# Altium PCB NB2DSK01.PcbDoc (part 1 of 17)
Units mil, origin at the board's own origin, x right, y up, seen from the top; angles counter-clockwise.
Board outline 11815 x 6500.03 mil, 8 copper layers (Top Layer, MidLayer1, MidLayer2, GND, PWR, MidLayer3, MidLayer4, Bottom Layer), stack 74.62 mil thick; 798 components, 1002 nets, 3927 pads, 3182 vias.
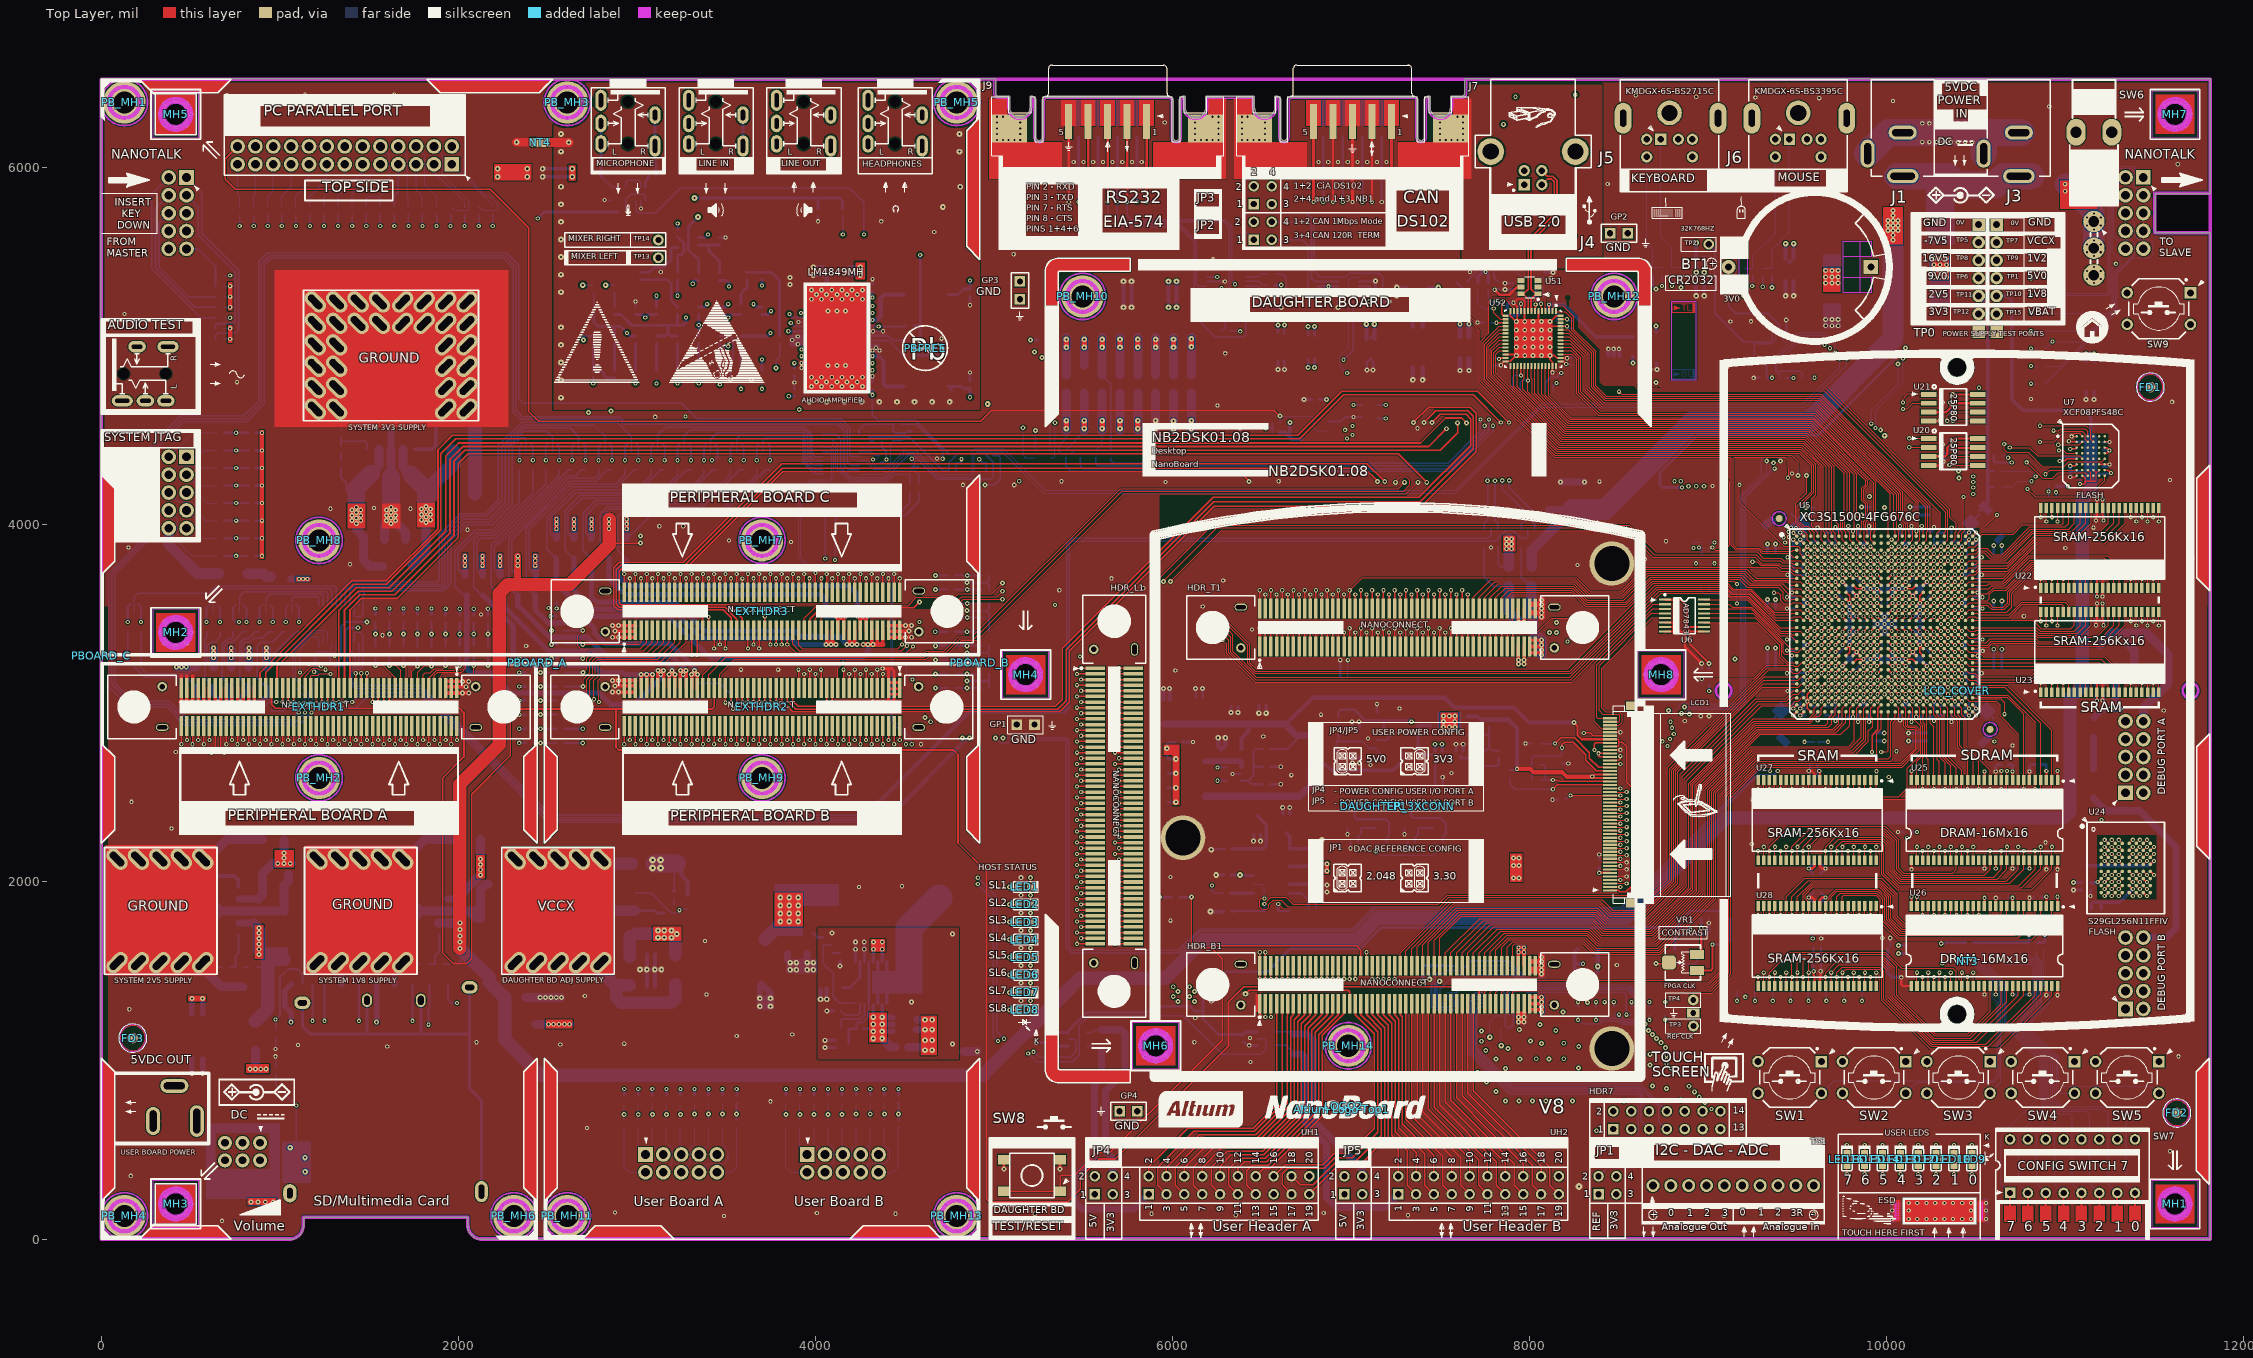
[diagram p0: Top Layer view]
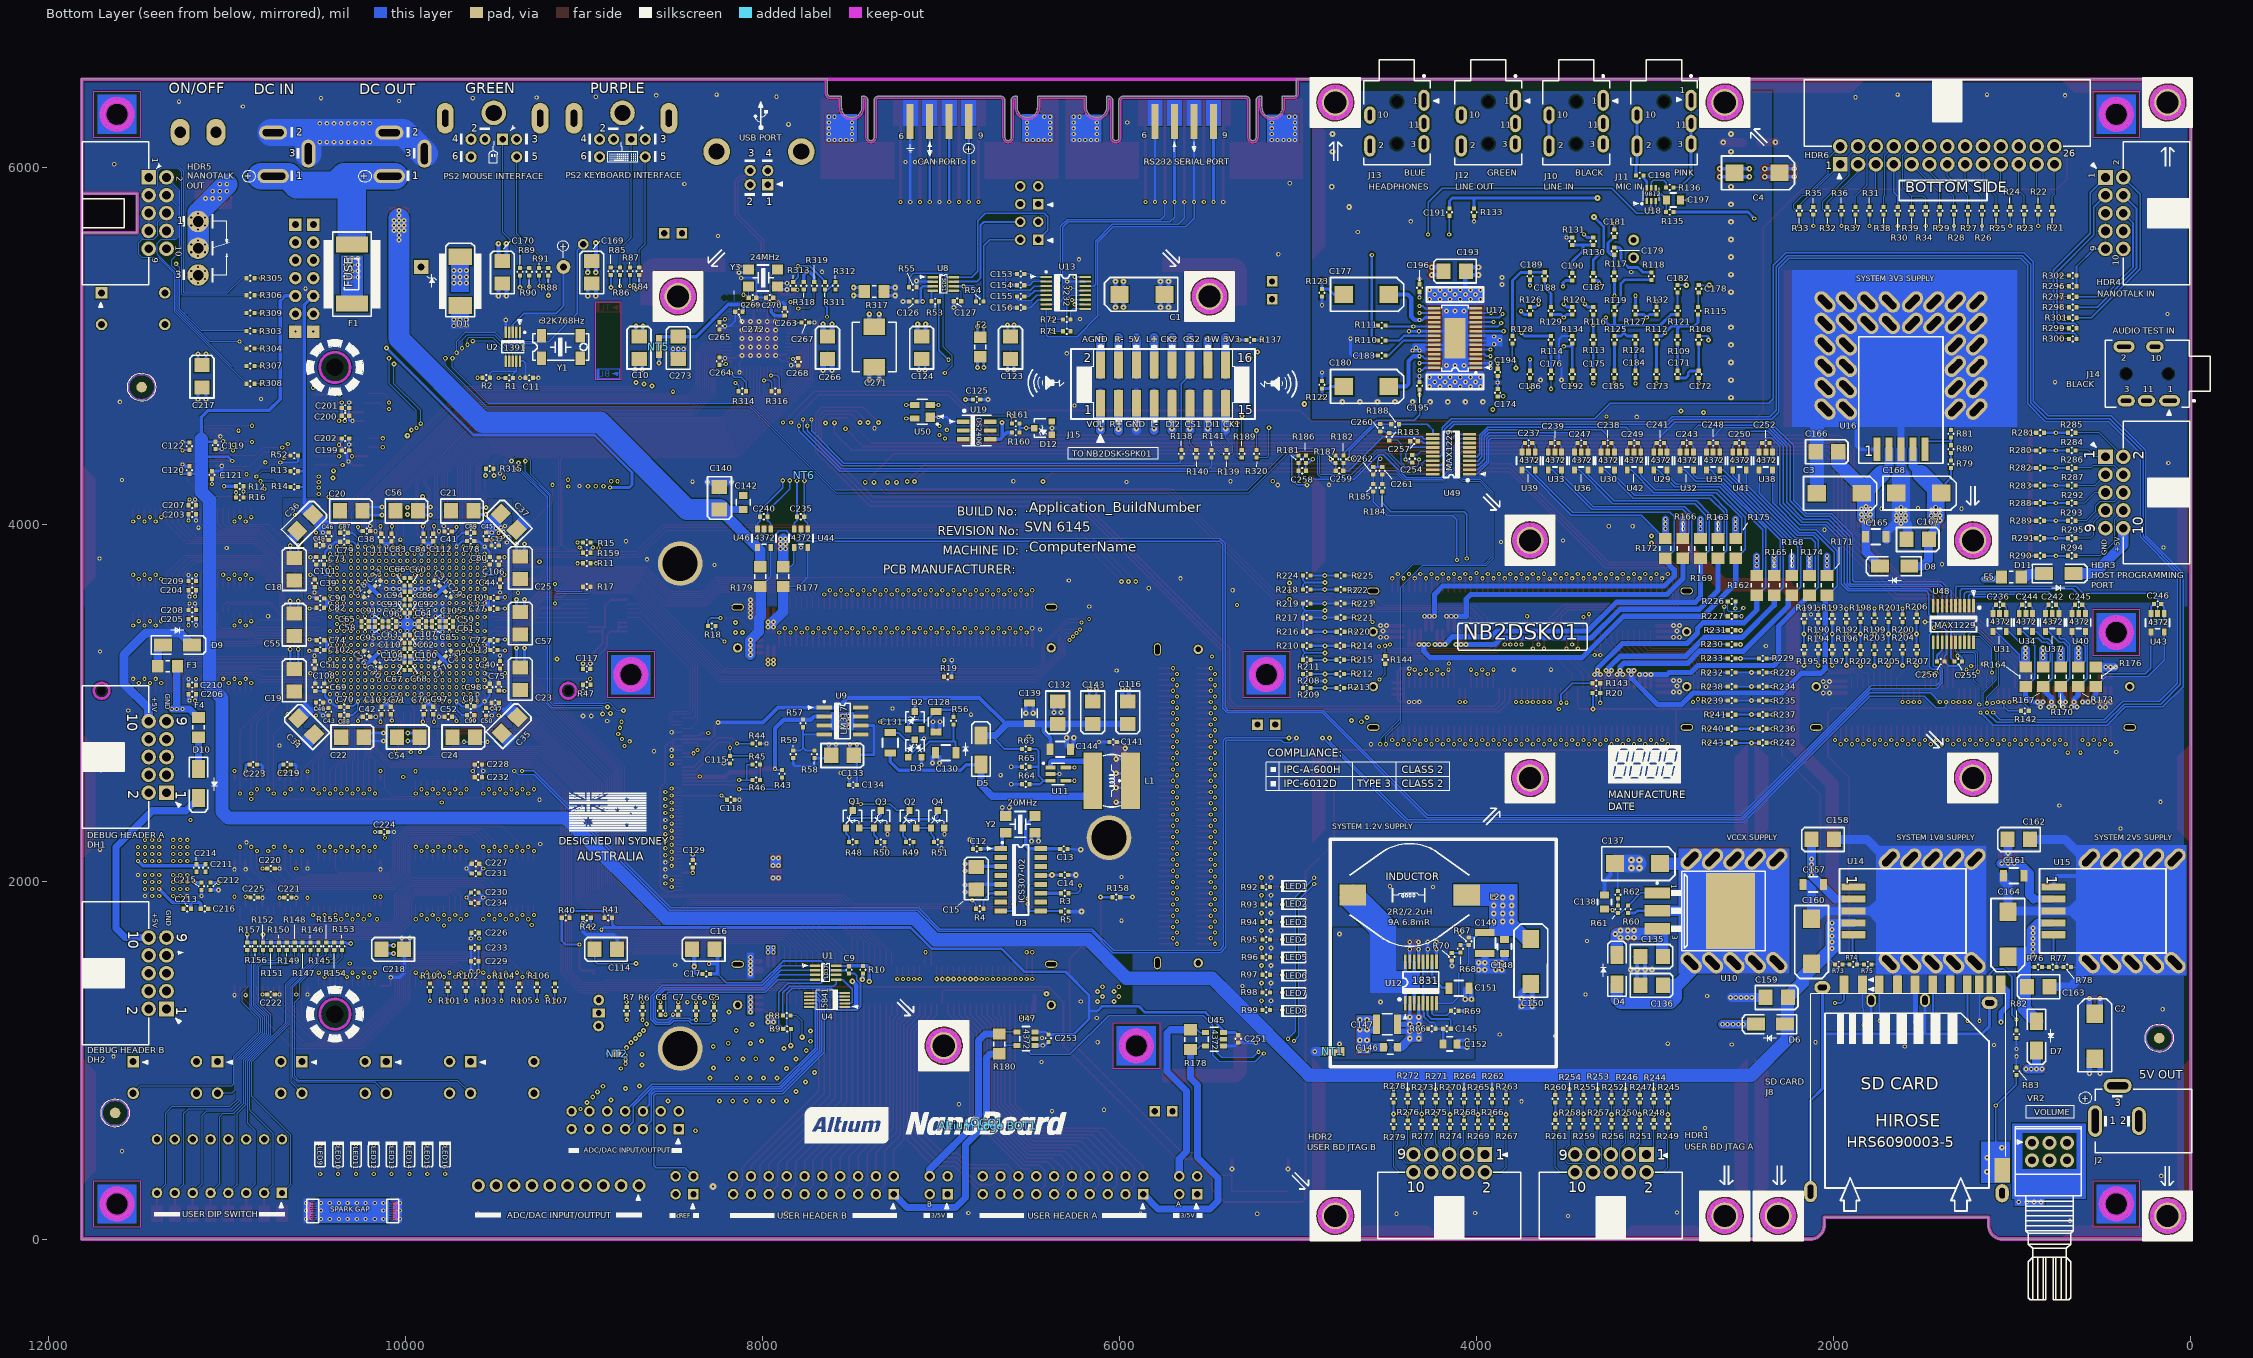
[diagram p1: Bottom Layer view, seen from below]
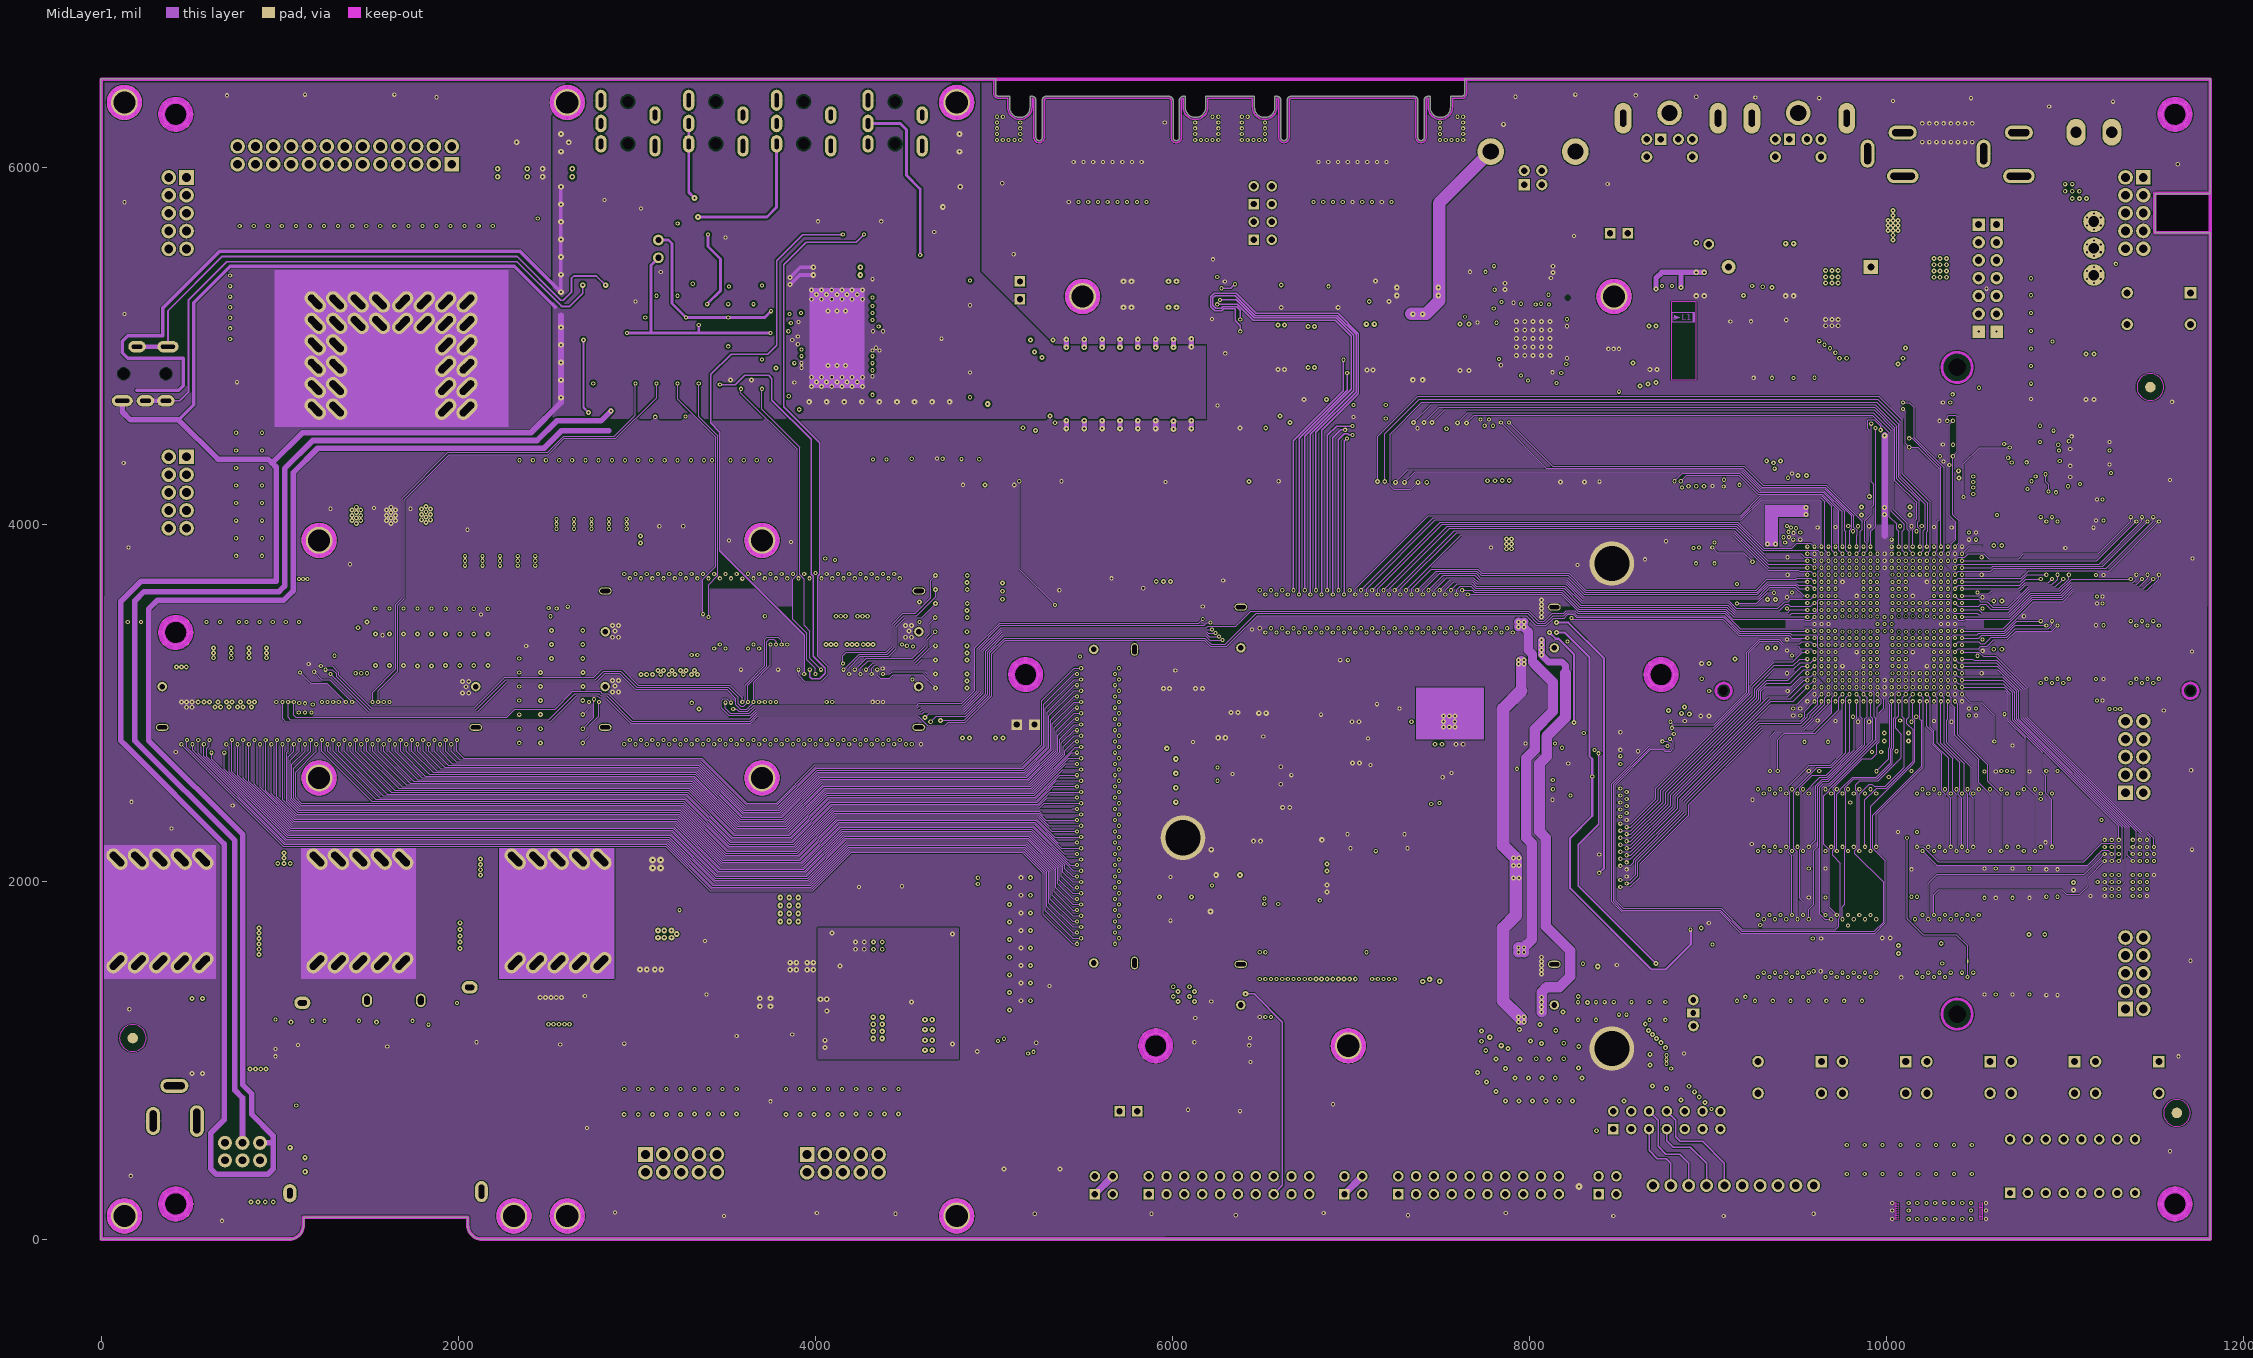
[diagram p2: MidLayer1]
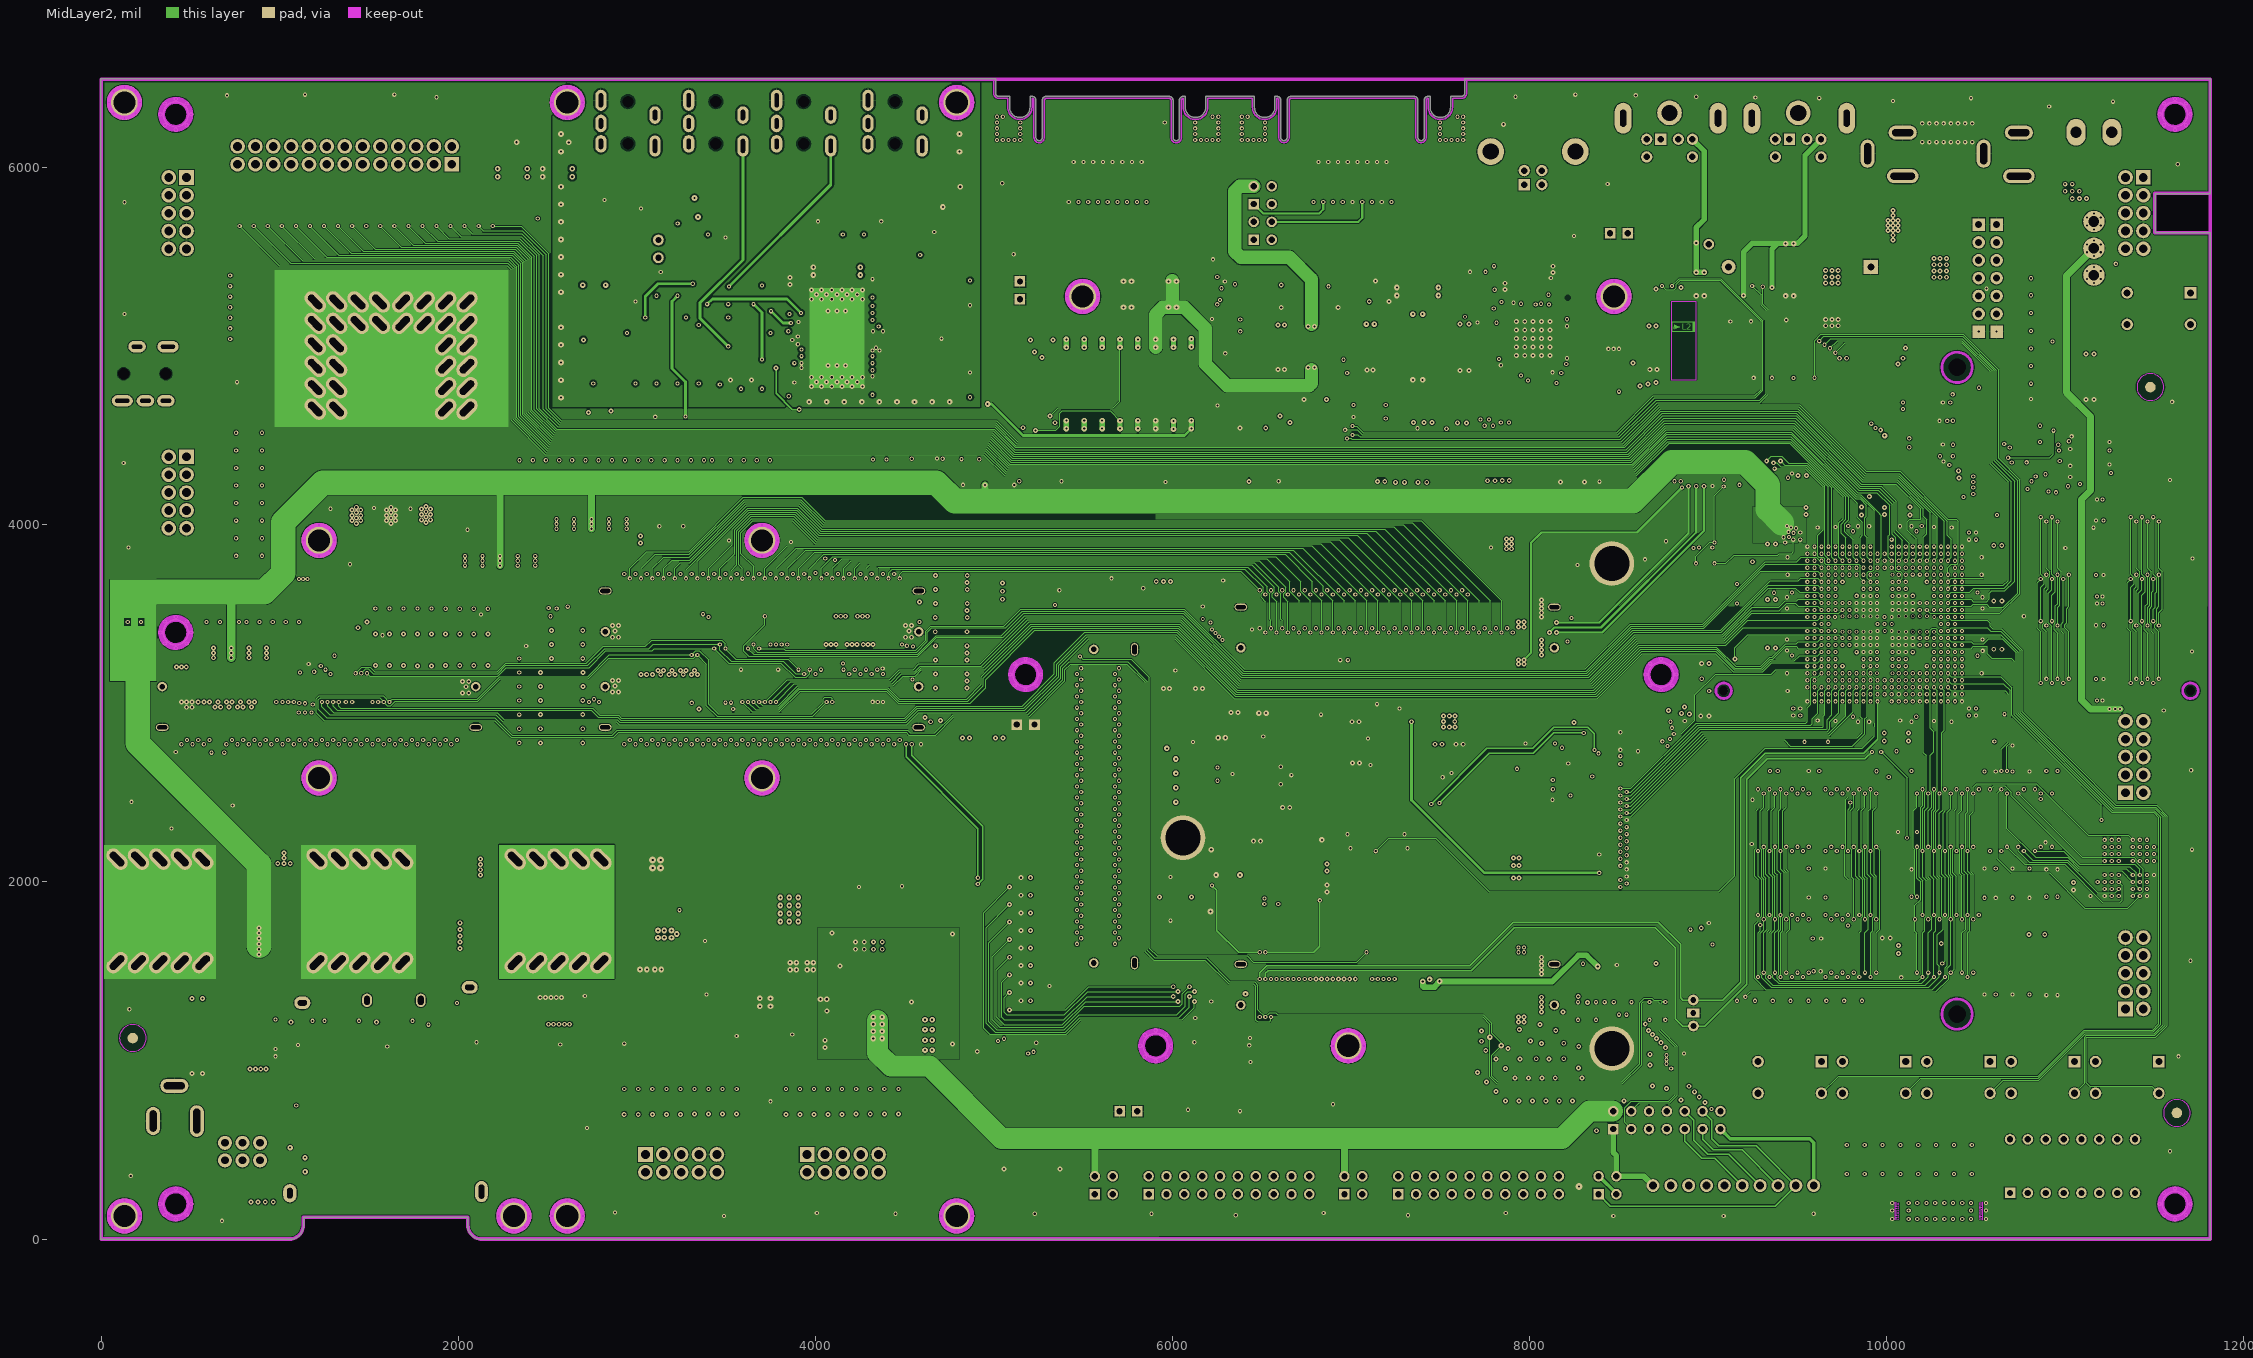
[diagram p3: MidLayer2]
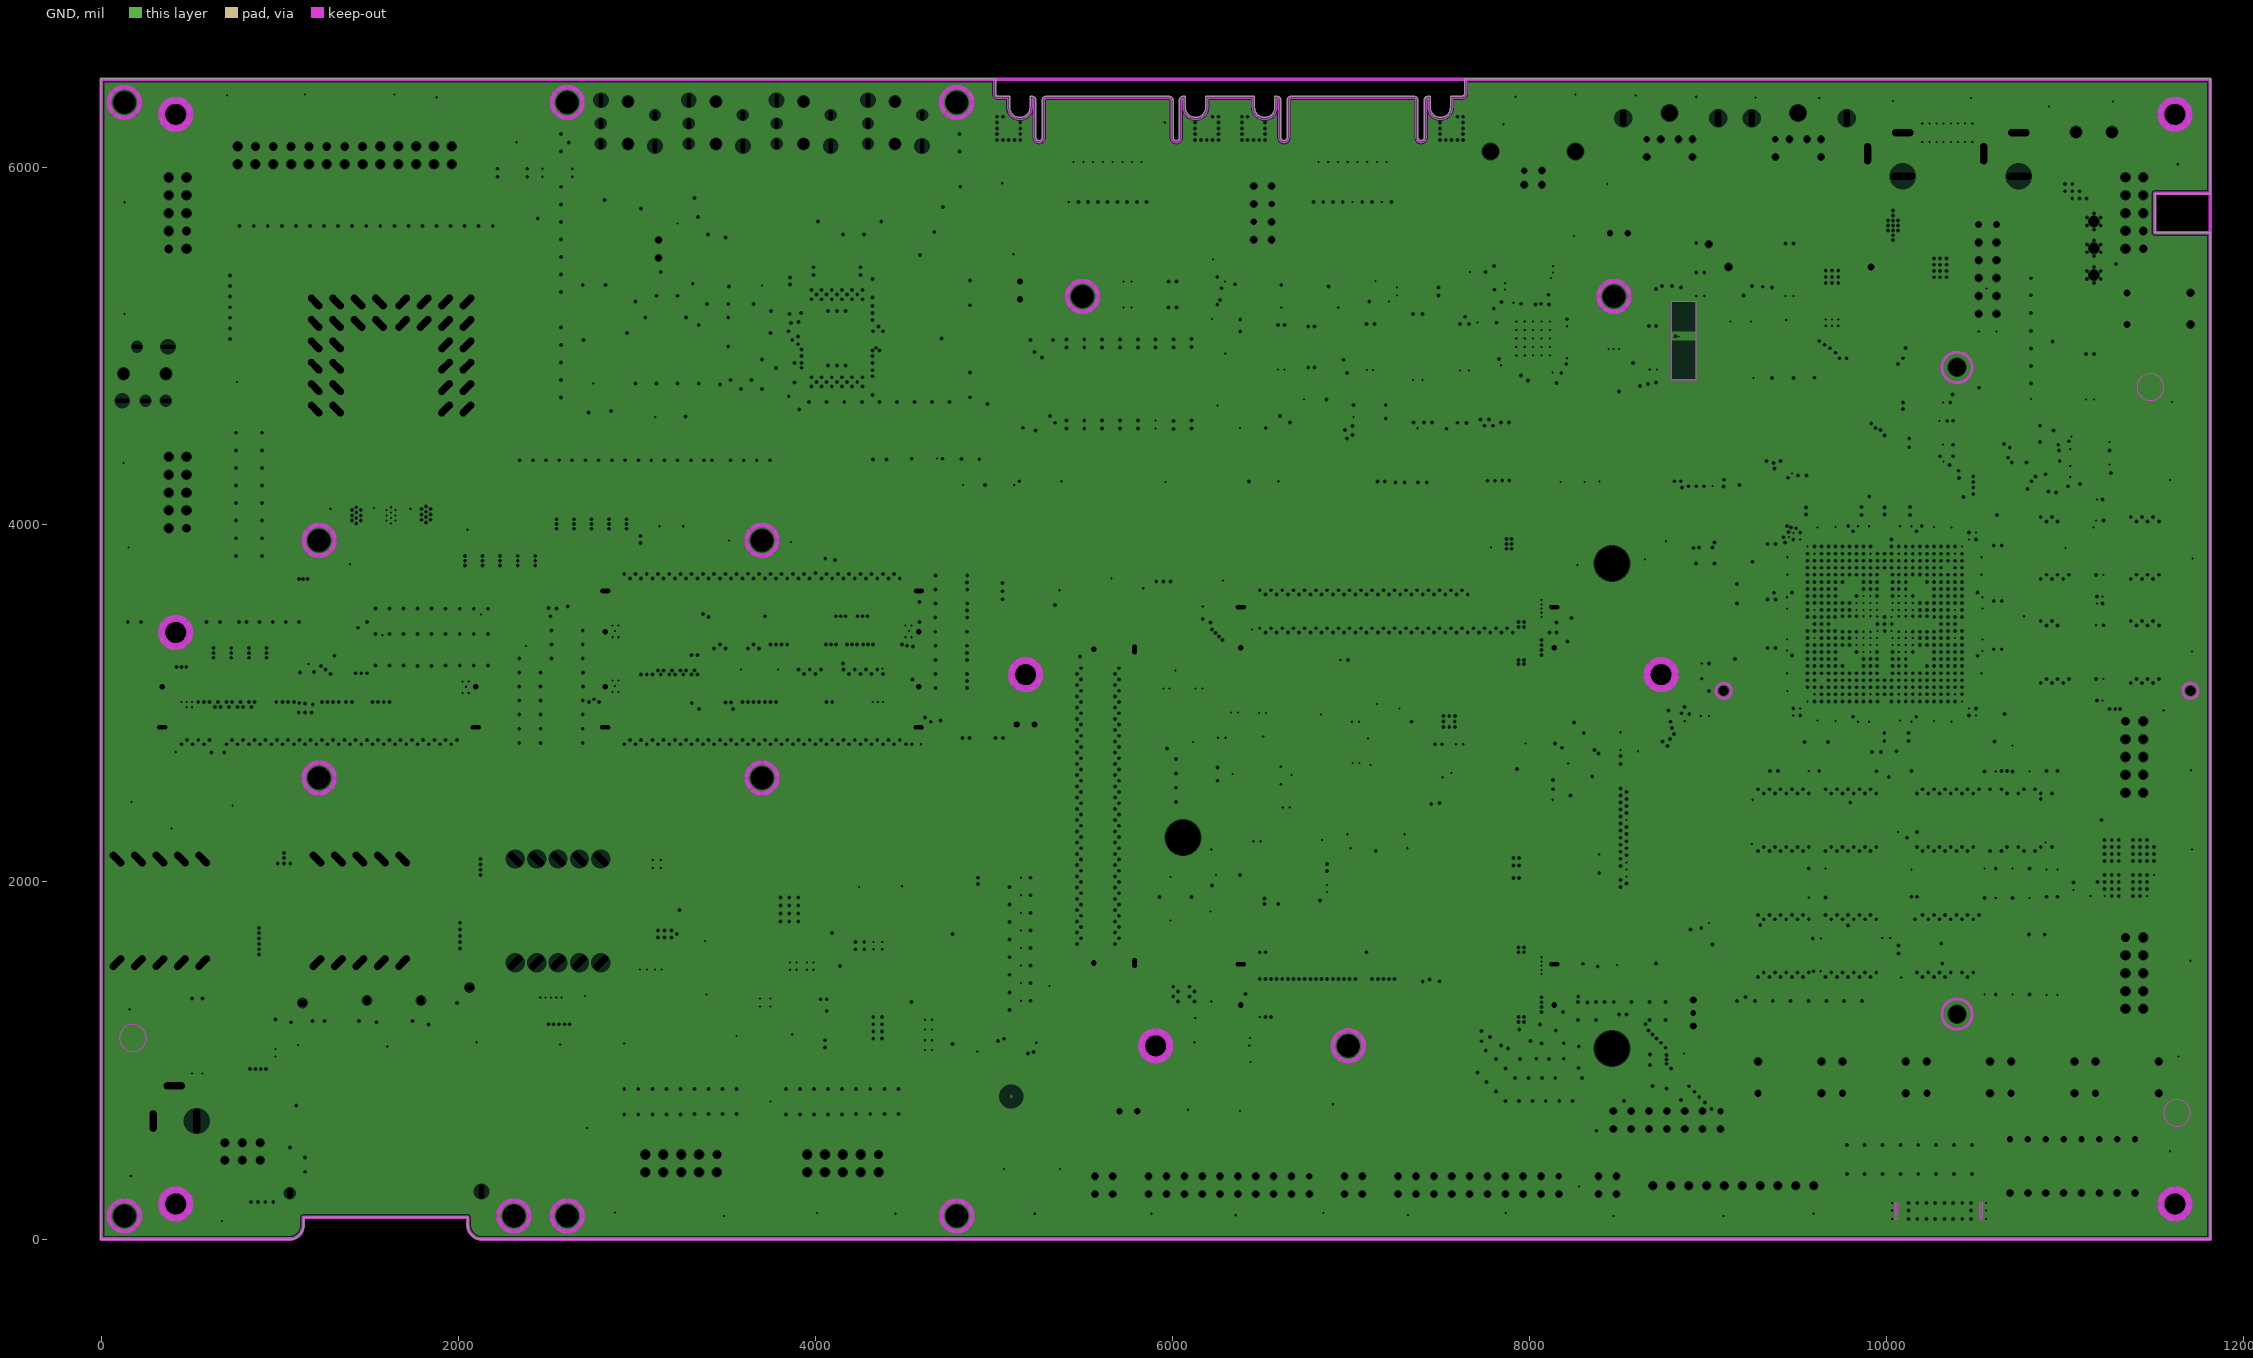
[diagram p4: GND, clearances drawn from the general rule]
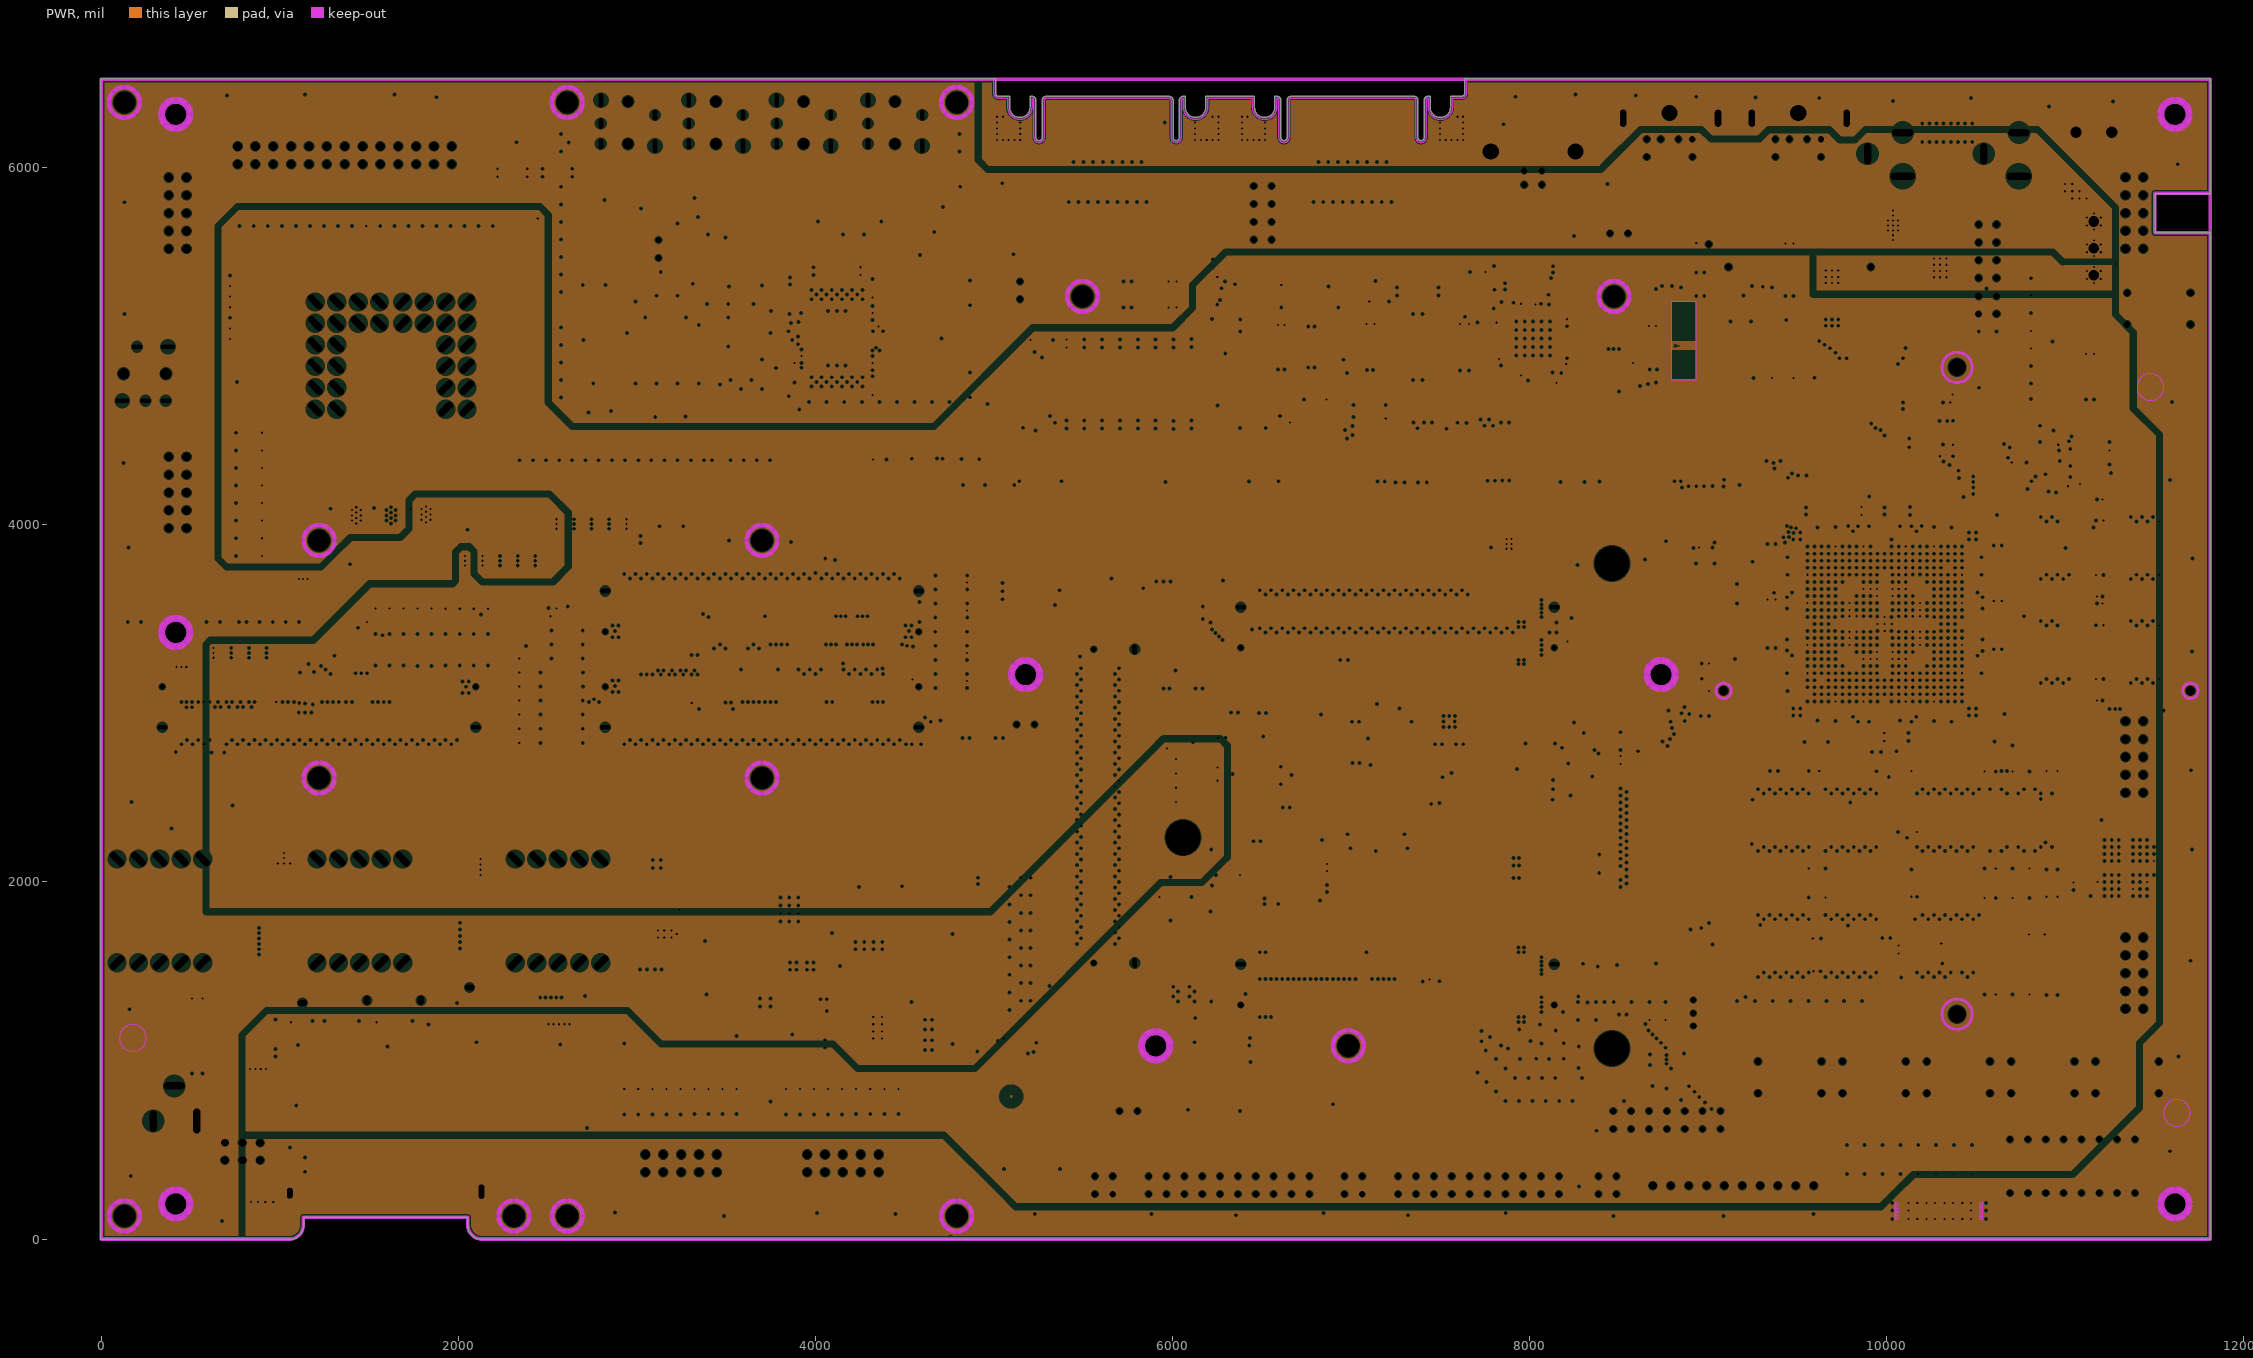
[diagram p5: PWR, clearances drawn from the general rule]
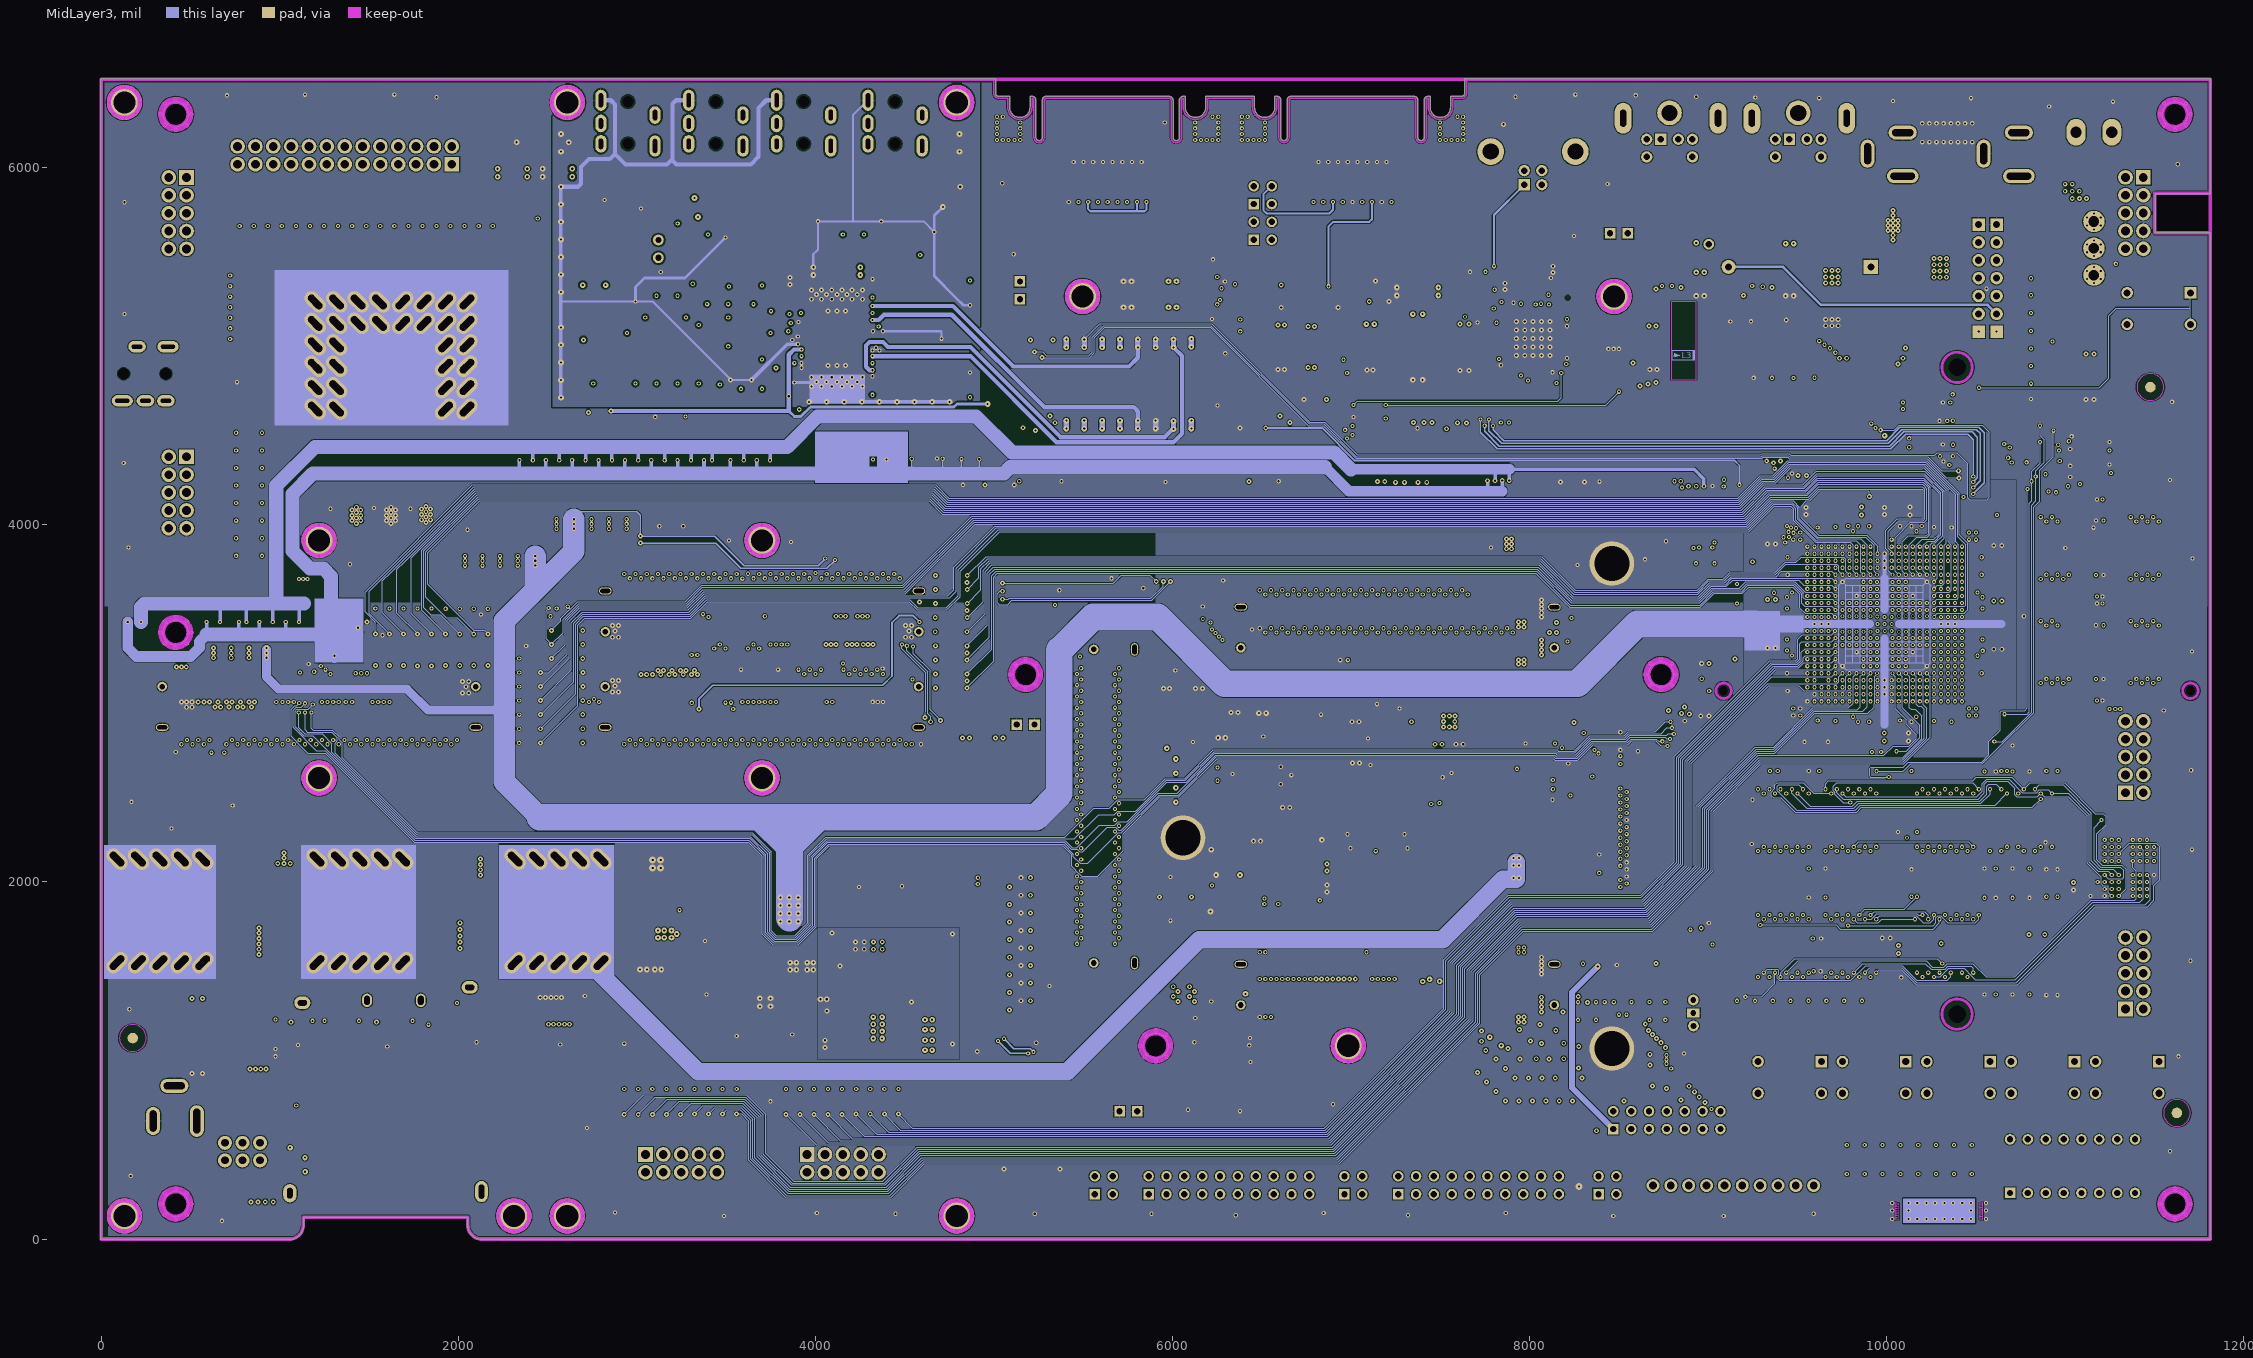
[diagram p6: MidLayer3]
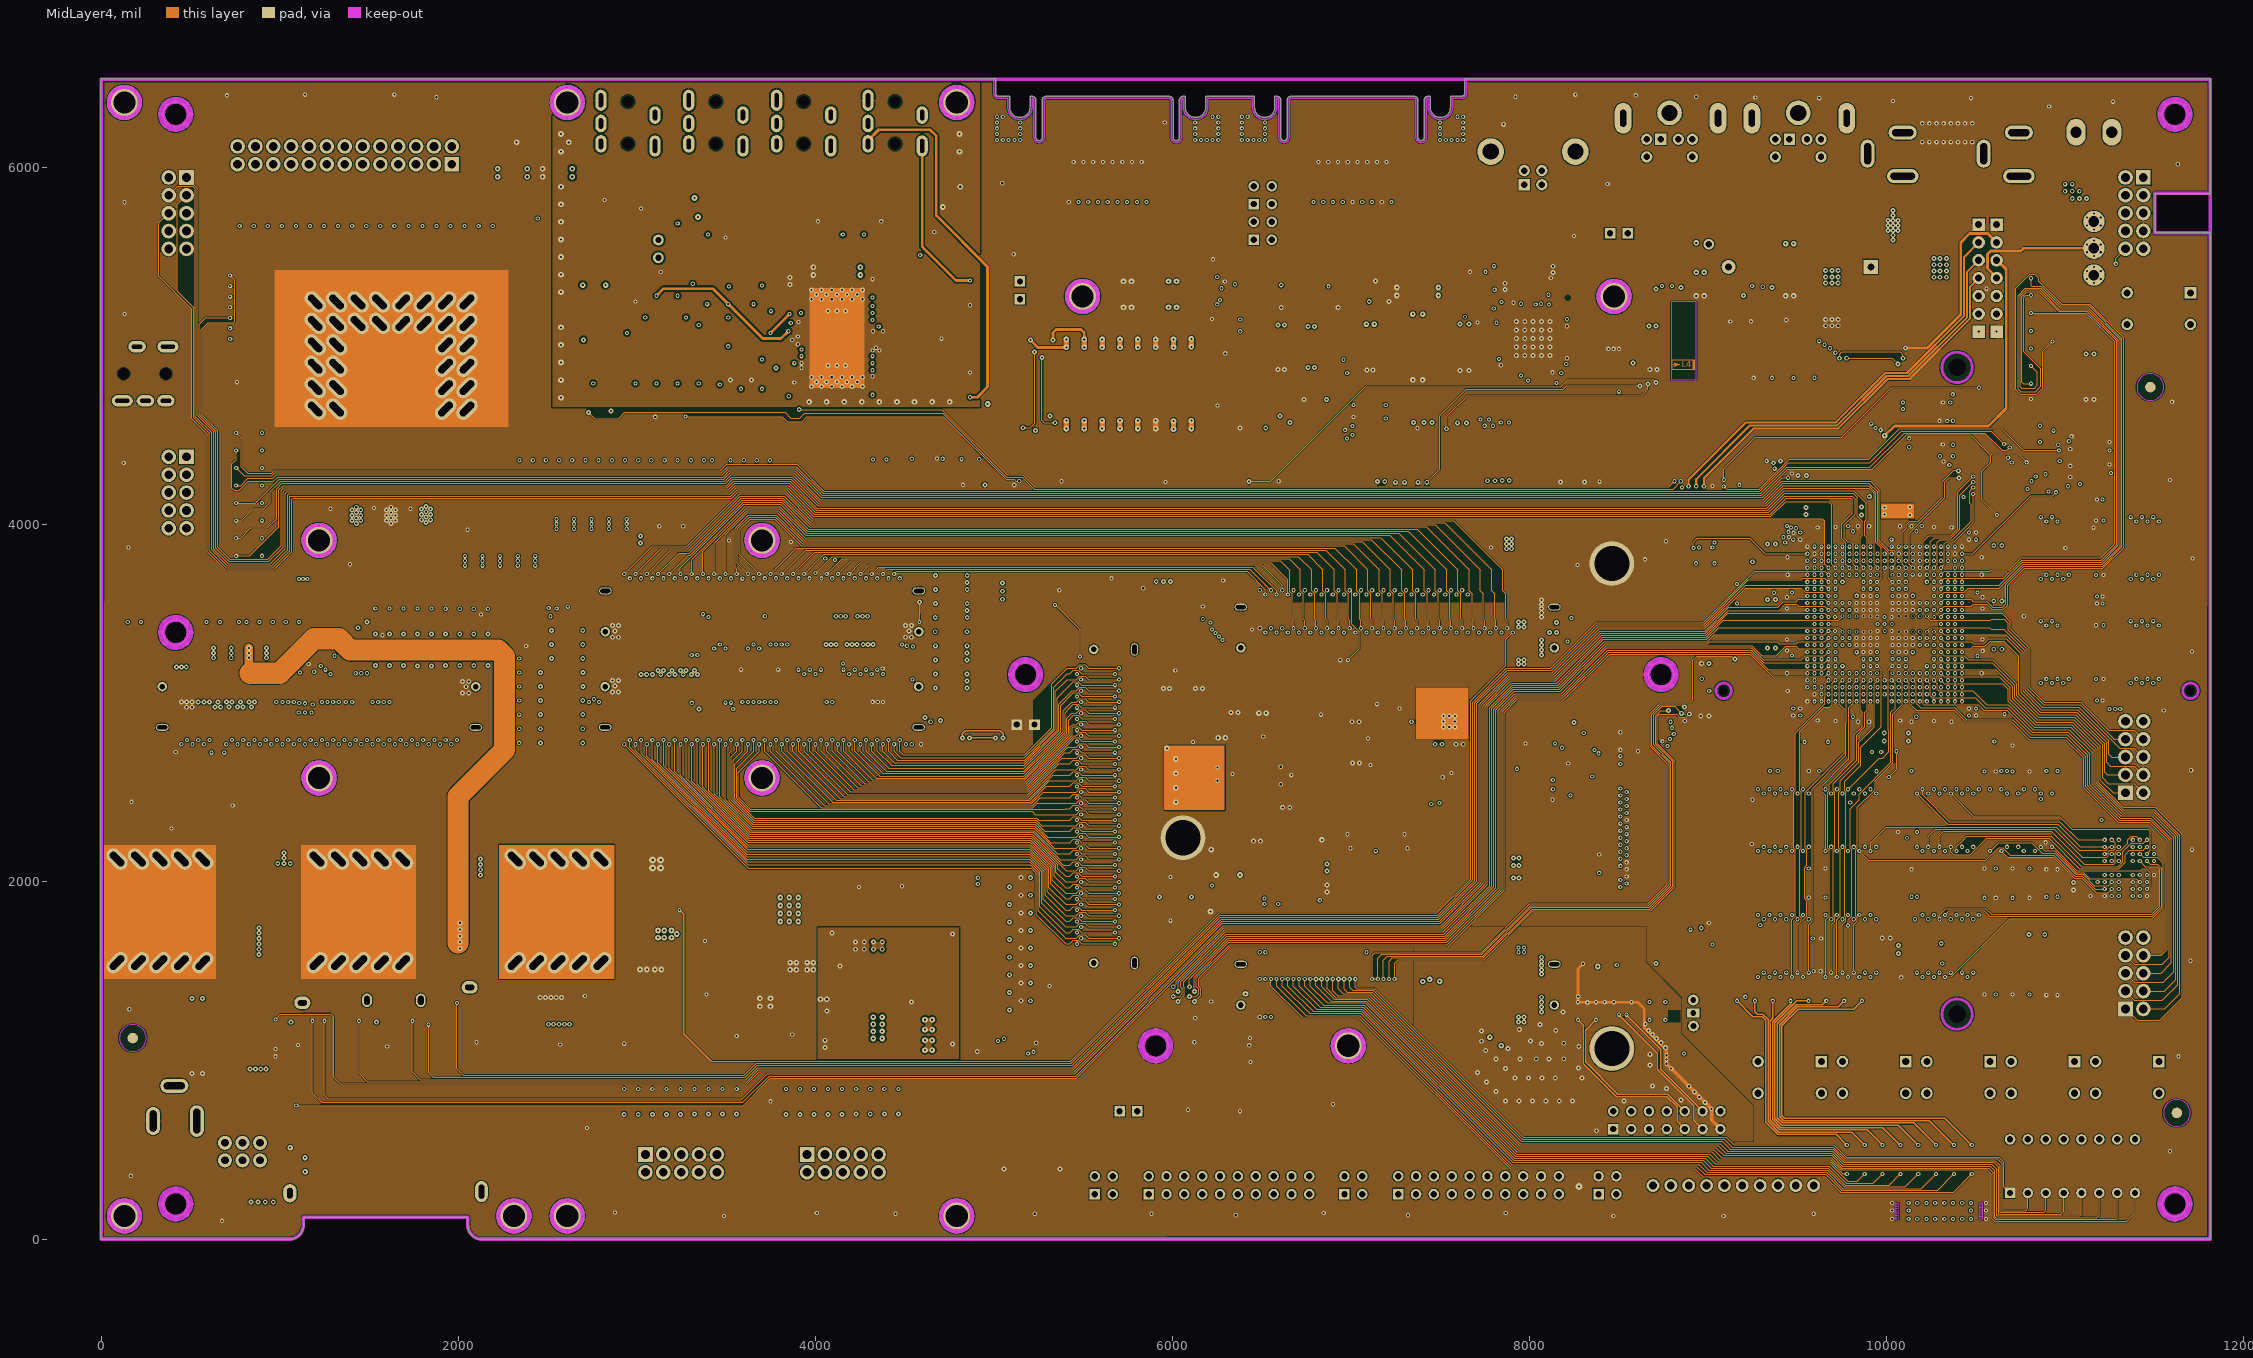
[diagram p7: MidLayer4]

## Layer stack, top to bottom
Top Layer: signal copper 1.4
Dielectric: core 9.0551, FR-4, Dk 4.8
MidLayer1: signal copper 1.4
Dielectric: prepreg 9.0551, FR-4, Dk 4.8
MidLayer2: signal copper 1.4
Dielectric: core 9.0551, FR-4, Dk 4.8
GND: plane copper 1.4173, net GND
Dielectric: prepreg 9.0551, FR-4, Dk 4.8
PWR: plane copper 1.4173, net (Multiple Nets)
Dielectric: core 9.0551, FR-4, Dk 4.8
MidLayer3: signal copper 1.4
Dielectric: prepreg 9.0551, FR-4, Dk 4.8
MidLayer4: signal copper 1.4
Dielectric: core 9.0551, FR-4, Dk 4.8
Bottom Layer: signal copper 1.4

## Board outline
0,-1.98 1053.39,-1.98 ccw(c1053.39,78.74) 1134.12,78.74 1134.12,121.47 2051.7,121.47 2051.7,78.74 ccw(c2132.42,78.74) 2132.42,-1.98 11811.02,-1.98 ccw(c11811.02,0) 11813.01,0 11813.01,5634.92 ccw(c11811.02,5634.92) 11811.02,5636.91 11503.18,5636.91 11503.18,5854.43 11811.02,5854.43 ccw(c11811.02,5856.42) 11813.01,5856.42 11813.01,6495.91 ccw(c11811.03,6496.06) 11813.01,6496.06 ccw(c11811.03,6496.06) 11811.03,6498.05 7637.8,6498.05 ccw(c7637.8,6496.06) 7635.82,6496.06 7635.82,6417.32 cw(c7618.11,6417.32) 7618.11,6399.62 7558.86,6399.62 ccw(c7558.86,6397.64) 7556.89,6397.42 7556.89,6338.58 cw(c7499.82,6338.58) 7442.75,6338.58 7442.75,6397.64 ccw(c7440.76,6397.64) 7440.76,6399.62 7431.12,6399.62 ccw(c7431.12,6377.95) 7409.45,6377.95 7409.45,6169.29 cw(c7391.75,6169.29) 7374.05,6169.29 7374.05,6377.95 ccw(c7352.38,6377.95) 7352.38,6399.62 6663.4,6399.62 ccw(c6663.4,6377.95) 6641.73,6377.95 6641.73,6169.29 cw(c6624.03,6169.29) 6606.33,6169.29 6606.33,6377.95 ccw(c6584.66,6377.95) 6584.66,6399.62 6575.02,6399.62 ccw(c6575.02,6397.64) 6573.03,6397.64 6573.03,6338.58 cw(c6515.96,6338.58) 6458.89,6338.58 6458.89,6397.64 ccw(c6456.91,6397.64) 6456.91,6399.62 6187.66,6399.62 ccw(c6187.66,6397.64) 6185.68,6397.64 6185.68,6338.58 cw(c6128.61,6338.58) 6071.53,6338.58 6071.53,6397.64 ccw(c6069.55,6397.64) 6069.55,6399.62 6059.91,6399.62 ccw(c6059.91,6377.95) 6038.24,6377.95 6038.24,6169.29 cw(c6020.54,6169.29) 6002.83,6169.29 6002.83,6377.95 ccw(c5981.16,6377.95) 5981.16,6399.62 5292.19,6399.62 ccw(c5292.19,6377.95) 5270.52,6377.95 5270.52,6169.29 cw(c5252.82,6169.29) 5235.12,6169.29 5235.12,6377.95 ccw(c5213.45,6377.95) 5213.45,6399.62 5203.8,6399.62 ccw(c5203.8,6397.64) 5201.82,6397.64 5201.82,6338.58 cw(c5144.75,6338.58) 5087.68,6338.58 5087.68,6397.64 ccw(c5085.69,6397.64) 5085.69,6399.62 5026.43,6399.62 cw(c5026.43,6417.32) 5008.73,6417.32 5008.73,6496.06 ccw(c5006.74,6496.06) 5006.74,6498.05 0,6498.05 ccw(c0,6496.06) -1.98,6496.06 -1.98,0 ccw(c0,0)

## Design rules (kind name [scope] priority, off if disabled: settings)
Clearance [InNamedPolygon('MidLayer3-AGND')] p1: gap=10
Clearance "Pad Via different nets" [IsPad vs IsVia] p2: gap=4.5
Clearance Clearance_Poly_USB [InNamedPolygon('USB-ML1-GND') Or InNamedPolygon('USB-TL-GND') Or InNamedPolygon('USB-TL-SHIELD')] p3: gap=10
Clearance Clearance_Poly_Tight [InNamedPolygon('FPGAPWR-BL-1V2') Or InNamedPolygon('FPGAPWR-BL-3V3') Or InNamedPolygon('FPGAPWR-BL-2V5A') Or InNamedPolygon('FPGAPWR-BL-2V5B') Or InNamedPolygon('FPGAPWR-BL-2V5C') Or InNamedPolygon('FPGAPWR-BL-2V5D') Or InNamedPolygon('FPGAPWR-ML1-1V2') Or InNamedPolygon('FPGAPWR-BL-2V5E') Or InNamedPolygon('FPGAPWR-BL-3V3' )] p4: gap=5
Clearance Clearance_Poly_AUGND [InPolygon And InNet(AUGND)] p5: gap=10
Clearance Clearance_PowerPolygon [InPolygon And InNetClass(PWRNET)] p6: gap=5
Clearance "Pad-Pad Clearance" [IsPad vs IsPad] p7: gap=5
Clearance "General Clearance" [All] p8: gap=5
ComponentClearance ComponentClearance_RES2RES [HasFootprint('RESC2012') vs HasFootprint('RESC2012')] p1: gap=-3.94 collisioncheckmode=3 verticalgap=10 showdistances=FALSE
ComponentClearance ComponentClearance_HDR2HDR [HasFootprint('HDR2X2') vs HasFootprint('HDR2X2')] p2: gap=-7.87 collisioncheckmode=3 verticalgap=10 showdistances=FALSE
ComponentClearance ComponentClearance_LED2LED [HasFootprint('LED2013') vs HasFootprint('LED2013')] p3: gap=-7.87 collisioncheckmode=3 verticalgap=10 showdistances=FALSE
ComponentClearance ComponentClearance_Bottom [OnBottom And (Not InComponentClass(Templates)) vs OnBottom And (Not InComponentClass(Templates))] p4: gap=3.94 collisioncheckmode=3 verticalgap=10 showdistances=FALSE
ComponentClearance ComponentClearance_Top [OnTop And (Not InComponentClass(Templates)) vs OnTop And (Not InComponentClass(Templates))] p5: gap=3.94 collisioncheckmode=3 verticalgap=10 showdistances=FALSE
DiffPairsRouting DiffPair_DiffPairsRouting [All] p1: maxlimit=12.6 minlimit=11.02 mostfreqgap=7.87 toplayer_prefgap=11.81 midlayer1_prefgap=11.81 midlayer2_prefgap=11.81 midlayer3_prefgap=11.81 midlayer4_prefgap=11.81 bottomlayer_prefgap=11.81 maxuncoupledlength=500
DiffPairsRouting PairRoute [All] p2: maxlimit=5.91 minlimit=5 mostfreqgap=5 maxuncoupledlength=393.7
FanoutControl Fanout_BGA [All] p1: bgadir=Out bgaviamode=Centered fanoutstyle=BGA fanoutdirection=OutOnly viagrid=1 // Fanout_BGA (Default Rule)
HoleSize [IsPad And (holesize <> 0)] p1: absolutevalues=TRUE maxlimit=204.72 minlimit=11.81 maxpercent=80.000 minpercent=20.000
MatchedLengths DiffPair_MatchedLengths [(IsDifferentialPair And (Name = 'USB_DP'))] p1: tolerance=393.7 checknetsindiffpair=TRUE checkdiffpairvsdiffpair=TRUE checkothers=TRUE
MatchedLengths DiffPair_MatchedLengths_1 [(IsDifferentialPair And (Name = 'DIFF_RX1'))] p2: tolerance=1000 checknetsindiffpair=TRUE checkdiffpairvsdiffpair=TRUE checkothers=TRUE
MinimumAnnularRing [PadIsPlated And (Name <> 'Y1_RT')] p1 off: minimumring=7.87
PlaneClearance [All] p1: clearance=5
PlaneConnect vias [IsVIA] p1: planeconnectstyle=Direct reliefexpansion=20 reliefentries=4 reliefconductorwidth=10 reliefairgap=10
PlaneConnect "PlaneConnect of large Pads" [(InComponent('DAUGHTER_3XCONN'))] p2: planeconnectstyle=Direct reliefexpansion=20 reliefentries=4 reliefconductorwidth=10 reliefairgap=10
PlaneConnect [All] p3: planeconnectstyle=Relief reliefexpansion=10 reliefentries=4 reliefconductorwidth=10 reliefairgap=5
PolygonConnect "Direct connection for large pads" [(InComponent('DAUGHTER_3XCONN'))] p1: connectstyle=Direct reliefconductorwidth=10 reliefentries=4 polygonreliefangle="90 Angle"
PolygonConnect "PolygonConnect - Heatsink" [IsVia] p2: connectstyle=Direct reliefconductorwidth=10 reliefentries=4 polygonreliefangle="90 Angle"
PolygonConnect [All] p3: connectstyle=Relief reliefconductorwidth=6 reliefentries=4 polygonreliefangle="90 Angle"
RoomDefinition U_AUTO_JTAG_UBA [InComponentClass('U_AUTO_JTAG_UBA')] p1: confinementstyle=ConfineIn formatcopy=TRUE lockcomponents=FALSE outline 3598.43,531.5 2834.65,531.5 2834.65,866.14 3598.43,866.14
RoomDefinition U_AUTO_JTAG_UBB [InComponentClass('U_AUTO_JTAG_UBB')] p2: confinementstyle=ConfineIn formatcopy=FALSE lockcomponents=FALSE outline 4562.99,531.5 3779.53,531.5 3779.53,866.14 4562.99,866.14
RoomDefinition AUTO_EXC [InComponentClass('AUTO_EXC')] p3: confinementstyle=ConfineIn formatcopy=TRUE lockcomponents=FALSE outline 2688.98,2732.28 2688.98,3456.69 2354.33,3456.69 2354.33,2732.28
RoomDefinition AUTO_EXB [InComponentClass('AUTO_EXB')] p4: confinementstyle=ConfineIn formatcopy=TRUE lockcomponents=FALSE outline 4681.1,3763.78 4681.1,3039.37 5015.75,3039.37 5015.75,3763.78
RoomDefinition AUTO_EXA [InComponentClass('AUTO_EXA')] p5: confinementstyle=ConfineIn formatcopy=TRUE lockcomponents=FALSE outline 1409.45,3220.47 2133.86,3220.47 2133.86,3555.12 1409.45,3555.12
RoutingVias [All] p1: holewidth=11.81 width=27.56 viastyle="Through Hole" minholewidth=11.81 minwidth=21.65 maxholewidth=39.37 maxwidth=78.74
ShortCircuit ShortCircuit_1 [Net = 'No Net' vs Net = 'No Net'] p1: allowed=TRUE
ShortCircuit [All] p2: allowed=FALSE
SolderMaskExpansion SolderMaskExpansion_Vias [IsVia] p1: expansion=-30
SolderMaskExpansion [All] p2: expansion=1.5
TestPointUsage [All] p1 off: valid=0 allowmultiple=FALSE
Testpoint [All] p1 off: side=15 testpointundercomponent=TRUE minsize=40 maxsize=100 preferedsize=60 minholesize=0 maxholesize=40 preferedholesize=32 testpointgrid=1 style=1023 order=0-112345678
Width DiffPair_Width [InDifferentialPair('USB_DP')] p1: maxlimit=12.6 minlimit=11.02 preferedwidth=11.81
Width Width_DiffPair [InNetClass('DiffPairs')] p2: maxlimit=7.09 minlimit=7.09 preferedwidth=7.09
Width [All] p3: maxlimit=157.48 minlimit=5 preferedwidth=10 toplayer_maxwidth=157.48 midlayer1_maxwidth=157.48 midlayer2_maxwidth=157.48 midlayer3_maxwidth=157.48 midlayer4_maxwidth=157.48 bottomlayer_maxwidth=157.48 minimp=50.000000 maximp=50.000000 favimp=50.000000
12 further rules are at their usual default settings.

## Classes and differential pairs
net class SPK: SPK.SPK_L+ SPK.SPK_L- SPK.SPK_R+ SPK.SPK_R- SPK.VOL
net class EXTCTRL: EXTCTRL#.1WIRE EXTCTRL.CS1_N EXTCTRL.CS2_N EXTCTRL.DIN1 EXTCTRL.DIN2 EXTCTRL.SCK1 EXTCTRL.SCK2
net class EXTCTRL#: EXTCTRL#.1WIRE EXTCTRL#.CS1_N EXTCTRL#.CS2_N EXTCTRL#.DIN1 EXTCTRL#.DIN2 EXTCTRL#.SCK1 EXTCTRL#.SCK2
net class AUDIO: AUDIO.AMP_L AUDIO.AMP_R AUDIO.HP_L AUDIO.HP_R AUDIO.HP_SENSE AUDIO.LIN_L AUDIO.LIN_R AUDIO.LOUT_L AUDIO.LOUT_R AUDIO.MIC "AUDIO.PARASITE PWR"
component class SPK: J15
component class NB2_EXTEND: R137 R138 R139 R140 R141 R189 R320
component class MICAMP: C197 C198 R135 R136 U18
component class CON_AUDIO: J10 J11 J12 J13 J14
component class AMP_LM4849: C174 C177 C180 C183 C187 C190 C193 C194 C195 C196 R110 R111 R116 R120 R122 R123 R127 R130 R131 R132 U17
component class USB_TXRX: C263 C264 C265 C266 C267 C268 C269 C270 C271 C272 C273 NT5 R311 R312 R313 R314 R315 R316 R317 R318 R319 U50 U51 U52 Y3
net class TFT_SPI: TFT_SPI.BUSY TFT_SPI.CLK TFT_SPI.CS_N TFT_SPI.DIN TFT_SPI.DOUT
component class U_NB2_DBCON: FP1 HDR_B1 HDR_L1 HDR_T1 R18 R19 R20
net class TFT#.CL[3..1]: TFT#.CL1 TFT#.CL2 TFT#.CL3
net class DAU_TFT.CL[3..1]: DAU_TFT.CL1 DAU_TFT.CL2 DAU_TFT.CL3
net class PDA: PDA.D0 PDA.D1 PDA.D2 PDA.D3 PDA.D4
net class PDA.D[4..0]: PDA.D0 PDA.D1 PDA.D2 PDA.D3 PDA.D4
net class SW[4..0]: SW0 SW1 SW2 SW3 SW4 SW5 SW6
component class CON_UBB: HDR2
component class CON_UBA: HDR1
component class CURR: C235 C236 C237 C238 C239 C240 C241 C242 C243 C244 C245 C246 C247 C248 C249 C250 C251 C252 C253 C254 C255 C256 C257 C258 C259 C260 C261 C262 NT6 R162 R163 R164 R165 R166 R167 R168 R169 R170 R171 R172 R173 R174 R175 R176 R177 R178 R179 R180 R181 R182 R183 R184 R185 R186 R187 R188 U29 U30 U31 U32 U33 U34 U35 U36 U37 U38 U39 U40 U41 U42 U43 U44 U45 U46 U47 U48 U49
component class FPGA_1: NT3 R17 TP3 TP4 U5
channel class JTAG_ALTIUM_AUTO: "JTAG CONFIG1" "JTAG CONFIG2" "JTAG CONFIG3" USER_BOARD_A USER_BOARD_B
component class NANOTALK: R296 R297 R298 R299 R300 R301 R302 R303 R304 R305 R306 R307 R308 R309
net class SRAM: SRAM.A0 SRAM.A1 SRAM.A2 SRAM.A3 SRAM.A4 SRAM.A5 SRAM.A6 SRAM.A7 SRAM.A8 SRAM.A9 SRAM.A10 SRAM.A11 SRAM.A12 SRAM.A13 SRAM.A14 SRAM.A15 SRAM.A16 SRAM.A17 SRAM.A18 SRAM.D0 SRAM.D1 SRAM.D2 SRAM.D3 SRAM.D4 SRAM.D5 SRAM.D6 SRAM.D7 SRAM.D8 SRAM.D9 SRAM.D10 SRAM.D11 SRAM.D12 SRAM.D13 SRAM.D14 SRAM.D15 SRAM.D16 SRAM.D17 SRAM.D18 SRAM.D19 SRAM.D20 SRAM.D21 SRAM.D22 SRAM.D23 SRAM.D24 SRAM.D25 SRAM.D26 SRAM.D27 SRAM.D28 SRAM.D29 SRAM.D30 SRAM.D31 SRAM.NBE0 SRAM.NBE1 SRAM.NBE2 SRAM.NBE3 SRAM.NCS SRAM.NOE SRAM.NWE
net class SFLASH: SFLASH.DIN SFLASH.DOUT SFLASH.FLASH1_CS_N SFLASH.FLASH2_CS_N SFLASH.SCLK
net class MEM.BUS_D[31..0]: MEM.BUS_D0 MEM.BUS_D1 MEM.BUS_D2 MEM.BUS_D3 MEM.BUS_D4 MEM.BUS_D5 MEM.BUS_D6 MEM.BUS_D7 MEM.BUS_D8 MEM.BUS_D9 MEM.BUS_D10 MEM.BUS_D11 MEM.BUS_D12 MEM.BUS_D13 MEM.BUS_D14 MEM.BUS_D15 MEM.BUS_D16 MEM.BUS_D17 MEM.BUS_D18 MEM.BUS_D19 MEM.BUS_D20 MEM.BUS_D21 MEM.BUS_D22 MEM.BUS_D23 MEM.BUS_D24 MEM.BUS_D25 MEM.BUS_D26 MEM.BUS_D27 MEM.BUS_D28 MEM.BUS_D29 MEM.BUS_D30 MEM.BUS_D31
net class MEM.BUS_A[24..1]: MEM.BUS_A1 MEM.BUS_A2 MEM.BUS_A3 MEM.BUS_A4 MEM.BUS_A5 MEM.BUS_A6 MEM.BUS_A7 MEM.BUS_A8 MEM.BUS_A9 MEM.BUS_A10 MEM.BUS_A11 MEM.BUS_A12 MEM.BUS_A13 MEM.BUS_A14 MEM.BUS_A15 MEM.BUS_A16 MEM.BUS_A17 MEM.BUS_A18 MEM.BUS_A19 MEM.BUS_A20 MEM.BUS_A21 MEM.BUS_A22 MEM.BUS_A23 MEM.BUS_A24
net class CM_SRAM: MEM.BUS_A2 MEM.BUS_A3 MEM.BUS_A4 MEM.BUS_A5 MEM.BUS_A6 MEM.BUS_A7 MEM.BUS_A8 MEM.BUS_A9 MEM.BUS_A10 MEM.BUS_A11 MEM.BUS_A12 MEM.BUS_A13 MEM.BUS_A14 MEM.BUS_A15 MEM.BUS_A16 MEM.BUS_A17 MEM.BUS_A18 MEM.BUS_A19 MEM.BUS_A20 MEM.BUS_D0 MEM.BUS_D1 MEM.BUS_D2 MEM.BUS_D3 MEM.BUS_D4 MEM.BUS_D5 MEM.BUS_D6 MEM.BUS_D7 MEM.BUS_D8 MEM.BUS_D9 MEM.BUS_D10 MEM.BUS_D11 MEM.BUS_D12 MEM.BUS_D13 MEM.BUS_D14 MEM.BUS_D15 MEM.BUS_D16 MEM.BUS_D17 MEM.BUS_D18 MEM.BUS_D19 MEM.BUS_D20 MEM.BUS_D21 MEM.BUS_D22 MEM.BUS_D23 MEM.BUS_D24 MEM.BUS_D25 MEM.BUS_D26 MEM.BUS_D27 MEM.BUS_D28 MEM.BUS_D29 MEM.BUS_D30 MEM.BUS_D31 MEM.BUS_NBE0 MEM.BUS_NBE1 MEM.BUS_NBE2 MEM.BUS_NBE3 MEM.BUS_NOE MEM.BUS_NWE MEM.BUS_SRAM_NCS
net class SRAM.NBE[3..0]: SRAM.NBE0 SRAM.NBE1 SRAM.NBE2 SRAM.NBE3
net class SRAM.D[31..0]: SRAM.D0 SRAM.D1 SRAM.D2 SRAM.D3 SRAM.D4 SRAM.D5 SRAM.D6 SRAM.D7 SRAM.D8 SRAM.D9 SRAM.D10 SRAM.D11 SRAM.D12 SRAM.D13 SRAM.D14 SRAM.D15 SRAM.D16 SRAM.D17 SRAM.D18 SRAM.D19 SRAM.D20 SRAM.D21 SRAM.D22 SRAM.D23 SRAM.D24 SRAM.D25 SRAM.D26 SRAM.D27 SRAM.D28 SRAM.D29 SRAM.D30 SRAM.D31
net class SRAM.A[18..0]: SRAM.A0 SRAM.A1 SRAM.A2 SRAM.A3 SRAM.A4 SRAM.A5 SRAM.A6 SRAM.A7 SRAM.A8 SRAM.A9 SRAM.A10 SRAM.A11 SRAM.A12 SRAM.A13 SRAM.A14 SRAM.A15 SRAM.A16 SRAM.A17 SRAM.A18
net class CM_SDRAM: MEM.BUS_A2 MEM.BUS_A3 MEM.BUS_A4 MEM.BUS_A5 MEM.BUS_A6 MEM.BUS_A7 MEM.BUS_A8 MEM.BUS_A9 MEM.BUS_A10 MEM.BUS_A11 MEM.BUS_A12 MEM.BUS_A13 MEM.BUS_A14 MEM.BUS_A15 MEM.BUS_A16 MEM.BUS_D0 MEM.BUS_D1 MEM.BUS_D2 MEM.BUS_D3 MEM.BUS_D4 MEM.BUS_D5 MEM.BUS_D6 MEM.BUS_D7 MEM.BUS_D8 MEM.BUS_D9 MEM.BUS_D10 MEM.BUS_D11 MEM.BUS_D12 MEM.BUS_D13 MEM.BUS_D14 MEM.BUS_D15 MEM.BUS_D16 MEM.BUS_D17 MEM.BUS_D18 MEM.BUS_D19 MEM.BUS_D20 MEM.BUS_D21 MEM.BUS_D22 MEM.BUS_D23 MEM.BUS_D24 MEM.BUS_D25 MEM.BUS_D26 MEM.BUS_D27 MEM.BUS_D28 MEM.BUS_D29 MEM.BUS_D30 MEM.BUS_D31 MEM.BUS_NBE0 MEM.BUS_NBE1 MEM.BUS_NBE2 MEM.BUS_NBE3 MEM.BUS_NWE MEM.BUS_SDRAM_CKE MEM.BUS_SDRAM_CLK MEM.BUS_SDRAM_NCAS MEM.BUS_SDRAM_NCS MEM.BUS_SDRAM_NRAS
net class CM_FLASH: MEM.BUS_A1 MEM.BUS_A2 MEM.BUS_A3 MEM.BUS_A4 MEM.BUS_A5 MEM.BUS_A6 MEM.BUS_A7 MEM.BUS_A8 MEM.BUS_A9 MEM.BUS_A10 MEM.BUS_A11 MEM.BUS_A12 MEM.BUS_A13 MEM.BUS_A14 MEM.BUS_A15 MEM.BUS_A16 MEM.BUS_A17 MEM.BUS_A18 MEM.BUS_A19 MEM.BUS_A20 MEM.BUS_A21 MEM.BUS_A22 MEM.BUS_A23 MEM.BUS_A24 MEM.BUS_D0 MEM.BUS_D1 MEM.BUS_D2 MEM.BUS_D3 MEM.BUS_D4 MEM.BUS_D5 MEM.BUS_D6 MEM.BUS_D7 MEM.BUS_D8 MEM.BUS_D9 MEM.BUS_D10 MEM.BUS_D11 MEM.BUS_D12 MEM.BUS_D13 MEM.BUS_D14 MEM.BUS_D15 MEM.BUS_FLASH_NBUSY MEM.BUS_FLASH_NCS MEM.BUS_FLASH_NRESET MEM.BUS_NOE MEM.BUS_NWE
component class IND_SRAM: C9_M C10_M C12_M C203 C204 C205 C206 C207 C208 C209 C210 U22 U23
component class COM_SRAM: C227 C228 C229 C230 C231 C232 C233 C234 U27 U28
component class COM_SDRAM: C219 C220 C221 C222 C223 C224 C225 C226 U2_CMx U3_CMx U25 U26
component class SERIAL_FLASH: C199 C200 C201 C202 U20 U21
component class COM_FLASH: C211 C212 C213 C214 C215 C216 U24
net class SPI: PBSPI.DIN PBSPI.DOUT PBSPI.SCLK
net class PBSPI: PBSPI.DIN PBSPI.DOUT PBSPI.SCLK
net class PBCTRLC.SPI_CS_N[1..0]: PBCTRLC.SPI_CS_N0 PBCTRLC.SPI_CS_N1
net class PBCTRLB.SPI_CS_N[1..0]: PBCTRLB.SPI_CS_N0 PBCTRLB.SPI_CS_N1
net class PBCTRLA.SPI_CS_N[1..0]: PBCTRLA.SPI_CS_N0 PBCTRLA.SPI_CS_N1
component class "JTAG CONFIG3": R226 R227 R228 R229 R230 R231 R232 R233 R234 R235 R236 R237 R238 R239 R240 R241 R242 R243
component class "JTAG CONFIG2": R208 R209 R210 R211 R212 R213 R214 R215 R216 R217 R218 R219 R220 R221 R222 R223 R224 R225
component class "JTAG CONFIG1": R190 R191 R192 R193 R194 R195 R196 R197 R198 R199 R200 R201 R202 R203 R204 R205 R206 R207
net class AOUTB: AOUTB.L AOUTB.R
net class AOUTA: AOUTA.L AOUTA.R
net class AOUT_HOST: AOUT_HOST.L AOUT_HOST.R
component class LCDTFT: C114 C115 C116 C117 C118 PL1_TF Q1 Q2 Q3 Q4 R40 R41 R42 R43 R44 R45 R46 R47 R48 R49 R50 R51 U6 VR1
component class RS232: C153 C154 C155 C156 R71 R72 U13
component class MOUSE: C170 R88 R89 R90 R91
component class KEYBOARD: C169 R84 R85 R86 R87
component class PPORT: C1_PP C2_PP C3_PP C4_PP C5_PP C6_PP C7_PP C8_PP C9_PP C10_PP C11_PP C12_PP R21 R22 R23 R24 R25 R26 R27 R28 R29 R30 R31 R32 R33 R34 R35 R36 R37 R38 R39
component class MOUNTS: "Altium Logo BOT1" "Altium Logo Top1" FD1 FD2 FD3 LAYERGAUGE LAYERGAUGE1 LAYERGAUGE2 LB1 LIVE_DESIGN_DECAL1 LOGO1 LOGO2 MH1 MH2 MH3 MH4 MH5 MH6 MH7 MH8 PB_MH1 PB_MH2 PB_MH3 PB_MH4 PB_MH5 PB_MH6 PB_MH7 PB_MH8 PB_MH9 PB_MH10 PB_MH11 PB_MH12 PB_MH13 PB_MH14 "SRKH LOGO"
component class PSU: C1 C2 C3 C4 C217 C218 D1 GP1 GP2 GP3 GP4 NT1
component class HOSTJTAG: R280 R281 R282 R283 R284 R285 R286 R287 R288 R289 R290 R291 R292 R293 R294 R295
component class DIPSWITCH: R145 R146 R147 R148 R149 R150 R151 R152 SW7
component class ADCDAC: C16 JP1 NT2 R6 R7 R8 R9 R10
component class CON_LCDTFT: LCD1
component class CON_MOUSE: J6
component class CON_KEYBOARD: J5
component class CON_ADCDAC: TS1
component class CON_IO: JP4 JP5 UH1 UH2
component class CON_ADCDAC_EXTEND: HDR7
component class CLK_PLL: C12 C13 C14 C15 R3 R4 R5 U3 Y2
component class CAN: C4_AD C5_AD C6_AD C7_AD C123 C124 C125 C126 C127 CTS1 JP2 R53 R54 R55 RTS1 RXD1 TXD1 U8
component class AUDIO_AMP: C171 C172 C173 C175 C176 C178 C179 C181 C182 C184 C185 C186 C188 C189 C191 C192 LS_L LS_R NT4 R108 R109 R112 R113 R114 R115 R117 R118 R119 R121 R124 R125 R126 R128 R129 R133 R134 TP13 TP14 VR2
net class USER_LED: USER_LED.L0 USER_LED.L1 USER_LED.L2 USER_LED.L3 USER_LED.L4 USER_LED.L5 USER_LED.L6 USER_LED.L7
net class HOST_LED: HOST_LED.L0 HOST_LED.L1 HOST_LED.L2 HOST_LED.L3 HOST_LED.L4 HOST_LED.L5 HOST_LED.L6 HOST_LED.L7
net class USER_LED.L[7..0]: USER_LED.L0 USER_LED.L1 USER_LED.L2 USER_LED.L3 USER_LED.L4 USER_LED.L5 USER_LED.L6 USER_LED.L7
net class HOST_LED.L[7..0]: HOST_LED.L0 HOST_LED.L1 HOST_LED.L2 HOST_LED.L3 HOST_LED.L4 HOST_LED.L5 HOST_LED.L6 HOST_LED.L7
component class HOST_LEDS: LED1 LED2 LED3 LED4 LED5 LED6 LED7 LED8 R92 R93 R94 R95 R96 R97 R98 R99
net class TFT#: TFT#.BLUE0 TFT#.BLUE1 TFT#.BLUE2 TFT#.BLUE3 TFT#.BLUE4 TFT#.CL1 TFT#.CL2 TFT#.CL3 TFT#.DISP_ON TFT#.GREEN0 TFT#.GREEN1 TFT#.GREEN2 TFT#.GREEN3 TFT#.GREEN4 TFT#.GREEN5 TFT#.LED_C_L TFT#.LED_C_R TFT#.M TFT#.POL TFT#.RED0 TFT#.RED1 TFT#.RED2 TFT#.RED3 TFT#.RED4 TFT#.STH TFT#.STV TFT#.V0 TFT#.V4 TFT#.V5 TFT#.V9 TFT#.VCOM TFT#.X_MINUS TFT#.X_PLUS TFT#.Y_MINUS TFT#.Y_PLUS
net class TFT#.RED[4..0]: TFT#.RED0 TFT#.RED1 TFT#.RED2 TFT#.RED3 TFT#.RED4
net class TFT#.GREEN[5..0]: TFT#.GREEN0 TFT#.GREEN1 TFT#.GREEN2 TFT#.GREEN3 TFT#.GREEN4 TFT#.GREEN5
net class TFT#.BLUE[4..0]: TFT#.BLUE0 TFT#.BLUE1 TFT#.BLUE2 TFT#.BLUE3 TFT#.BLUE4
component class DAC: C17 U4
component class ADC: C5 C6 C7 C8 C9 U1
component class FPGA_PRGSETUP_1: R11 R12 R13 R14 R15 R16
component class FPGA_CONFIGFLASH_1: C119 C120 C121 C122 R52 TFT#.RED3 U7
component class DECOUPLING_CAPS_3V3_1: C54 C55 C56 C57 C58 C59 C60 C61 C62 C63 C64 C65 C66 C67 C68 C69 C70 C71 C72 C73 C74 C75 C76 C77 C78 C79 C80 C81 C82 C83 C84 C85 C86 C87 C88 C89 C90 C91 C92 C93 C94 C95 C96 C97 C98 C99 C100 C101 C102 C103 C104 C105 C106 C107 C108 C109 C110 C111 C112 C113
component class DECOUPLING_CAPS_2V5_1: C34 C35 C36 C37 C38 C39 C40 C41 C42 C43 C44 C45 C46 C47 C48 C49 C50 C51 C52 C53
component class DECOUPLING_CAPS_1V2_1: C18 C19 C20 C21 C22 C23 C24 C25 C26 C27 C28 C29 C30 C31 C32 C33
net class PWRNET: 1V2 1V8 2V5 3V3 5V0 5VUSW AGND GND VCCX
pad class "GND Net Link Pads": NT1-1 NT1-2 NT2-1 NT2-2
pad class Connector_Slot_Pads: J6-1 J6-3 J7-1 J7-2 J7-3 U1MIC-6
polygon class HeatsinkPolygons: POWER-BL-1V2 POWER-BL-1V8 POWER-BL-2V5 POWER-BL-3V3 POWER-BL-VCCX POWER-TL-1V2 POWER-TL-1V8 POWER-TL-2V5 POWER-TL-3V3 POWER-TL-VCCX
net class DAU_TFT.BLUE[4..0]: DAU_TFT.BLUE0 DAU_TFT.BLUE1 DAU_TFT.BLUE2 DAU_TFT.BLUE3 DAU_TFT.BLUE4
net class DAU_TFT.GREEN[5..0]: DAU_TFT.GREEN0 DAU_TFT.GREEN1 DAU_TFT.GREEN2 DAU_TFT.GREEN3 DAU_TFT.GREEN4 DAU_TFT.GREEN5
net class DAU_TFT.RED[4..0]: DAU_TFT.RED0 DAU_TFT.RED1 DAU_TFT.RED2 DAU_TFT.RED3 DAU_TFT.RED4
net class DAU_SPI: DAU_SPI.CLK DAU_SPI.DIN DAU_SPI.DOUT DAU_SPI.MODE DAU_SPI.SEL
net class DAU_TFT: DAU_TFT.BLIGHT DAU_TFT.BLUE0 DAU_TFT.BLUE1 DAU_TFT.BLUE2 DAU_TFT.BLUE3 DAU_TFT.BLUE4 DAU_TFT.CL1 DAU_TFT.CL2 DAU_TFT.CL3 DAU_TFT.DISP_ON DAU_TFT.GREEN0 DAU_TFT.GREEN1 DAU_TFT.GREEN2 DAU_TFT.GREEN3 DAU_TFT.GREEN4 DAU_TFT.GREEN5 DAU_TFT.IRQ DAU_TFT.M DAU_TFT.MUX DAU_TFT.POL DAU_TFT.RED0 DAU_TFT.RED1 DAU_TFT.RED2 DAU_TFT.RED3 DAU_TFT.RED4 DAU_TFT.STH DAU_TFT.STV
net class TFT: TFT#.BLUE0 TFT#.BLUE1 TFT#.BLUE2 TFT#.BLUE3 TFT#.BLUE4 TFT#.CL1 TFT#.CL2 TFT#.CL3 TFT#.DISP_ON TFT#.GREEN0 TFT#.GREEN1 TFT#.GREEN2 TFT#.GREEN3 TFT#.GREEN4 TFT#.GREEN5 TFT#.M TFT#.POL TFT#.RED0 TFT#.RED1 TFT#.RED2 TFT#.RED3 TFT#.RED4 TFT#.STH TFT#.STV TFT.BLIGHT TFT.IRQ
component class COMP_1V2: C145
component class PBA: EXTHDR1 R142
component class PBB: EXTHDR2 R143
component class PBC: EXTHDR3 R144
net class JTAG: JTAG.DETECTPBA JTAG.DETECTPBB JTAG.DETECTPBC JTAG.HARD.TCKPBA JTAG.HARD.TCKPBB JTAG.HARD.TCKPBC JTAG.HARD.TDIPBA JTAG.HARD.TDIPBB JTAG.HARD.TDIPBC JTAG.HARD.TDOPBA JTAG.HARD.TDOPBB JTAG.HARD.TDOPBC JTAG.HARD.TMSPBA JTAG.HARD.TMSPBB JTAG.HARD.TMSPBC JTAG.SOFT.TCKPBA JTAG.SOFT.TCKPBB JTAG.SOFT.TCKPBC JTAG.SOFT.TDIPBA JTAG.SOFT.TDIPBB JTAG.SOFT.TDIPBC JTAG.SOFT.TDOPBA JTAG.SOFT.TDOPBB JTAG.SOFT.TDOPBC JTAG.SOFT.TMSPBA JTAG.SOFT.TMSPBB JTAG.SOFT.TMSPBC "RS232_CON.DCD P1" "RS232_CON.DSR P6" "RS232_CON.DTR P4" "RS232_CON.SGND P5"
net class USB#: USB#.DMINUS USB#.DPLUS USB#.VBUS
net class USB.D[15..0]: USB.D0 USB.D1 USB.D2 USB.D3 USB.D4 USB.D5 USB.D6 USB.D7 USB.D8 USB.D9 USB.D10 USB.D11 USB.D12 USB.D13 USB.D14 USB.D15
net class USB: USB.D0 USB.D1 USB.D2 USB.D3 USB.D4 USB.D5 USB.D6 USB.D7 USB.D8 USB.D9 USB.D10 USB.D11 USB.D12 USB.D13 USB.D14 USB.D15 USB.FIFOADR0 USB.FIFOADR1 USB.FIFOADR2 USB.FLAGA USB.FLAGB USB.FLAGC USB.FLAGD_CS_N USB.IFCLK USB.INT_N USB.PKTEND USB.RD_N USB.READY USB.RESET_N USB.SLOE USB.VBUS USB.WR_N USB.XTALIN USB.XTALOUT
component class CON_SD: J8 R82 R83
net class CAN#: "CAN#.CAN_GND P3" CAN#.CAN_H CAN#.CAN_L "CAN#.GND P6"
net class CAN: CAN.RXD CAN.TXD
net class HJTAG#: HJTAG#.HARD.TCK HJTAG#.HARD.TDI HJTAG#.HARD.TDO HJTAG#.HARD.TMS HJTAG#.SOFT.TCK HJTAG#.SOFT.TDI HJTAG#.SOFT.TDO HJTAG#.SOFT.TMS
net class HJTAG: HJTAG.HARD.TCK HJTAG.HARD.TDI HJTAG.HARD.TDO HJTAG.HARD.TMS HJTAG.SOFT.TCK HJTAG.SOFT.TDI HJTAG.SOFT.TDO HJTAG.SOFT.TMS
net class KEYBOARD#: KEYBOARD#.CLOCK KEYBOARD#.DATA
net class KEYBOARD: KEYBOARD.CLOCK KEYBOARD.DATA
net class MOUSE#: MOUSE#.CLOCK MOUSE#.DATA
net class MOUSE: MOUSE.CLOCK MOUSE.DATA
net class RS232#: RS232#.CTS RS232#.DCD "RS232#.DCD P1" "RS232#.DSR P6" "RS232#.DTR P4" RS232#.RI RS232#.RTS RS232#.RXD "RS232#.SGND P5" RS232#.TXD
net class RS232: RS232.CTS "RS232.DCD P1" "RS232.DSR P6" "RS232.DTR P4" "RS232.RI P9" RS232.RTS RS232.RXD "RS232.SGND P5" RS232.TXD
net class SD.DAT[3..0]: SD.DAT0 SD.DAT1 SD.DAT2 SD.DAT3
net class SD: SD.CLK SD.CMD SD.DAT0 SD.DAT1 SD.DAT2 SD.DAT3 SD.DETECT SD.PROTECT
net class TALK#: TALK#.MASTER.CNCT TALK#.MASTER.MODE TALK#.MASTER.TCK TALK#.MASTER.TDI TALK#.MASTER.TDO TALK#.MASTER.TMS TALK#.SLAVE.CNCT TALK#.SLAVE.MODE TALK#.SLAVE.TCK TALK#.SLAVE.TDI TALK#.SLAVE.TDO TALK#.SLAVE.TMS
net class TALK: TALK#.MASTER.MODE TALK#.MASTER.TCK TALK#.MASTER.TDI TALK#.MASTER.TMS TALK#.SLAVE.TDO TALK.MASTER.CNCT TALK.MASTER.TDO TALK.SLAVE.CNCT TALK.SLAVE.MODE TALK.SLAVE.TCK TALK.SLAVE.TDI TALK.SLAVE.TMS
net class UBA#: UBA#.DETECT UBA#.HARD.TCK UBA#.HARD.TDI UBA#.HARD.TDO UBA#.HARD.TMS UBA#.SOFT.TCK UBA#.SOFT.TDI UBA#.SOFT.TDO UBA#.SOFT.TMS
net class UBA: UBA.DETECT UBA.HARD.TCK UBA.HARD.TDI UBA.HARD.TDO UBA.HARD.TMS UBA.SOFT.TCK UBA.SOFT.TDI UBA.SOFT.TDO UBA.SOFT.TMS
net class UBB#: UBB#.DETECT UBB#.HARD.TCK UBB#.HARD.TDI UBB#.HARD.TDO UBB#.HARD.TMS UBB#.SOFT.TCK UBB#.SOFT.TDI UBB#.SOFT.TDO UBB#.SOFT.TMS
net class UBB: UBB.DETECT UBB.HARD.TCK UBB.HARD.TDI UBB.HARD.TDO UBB.HARD.TMS UBB.SOFT.TCK UBB.SOFT.TDI UBB.SOFT.TDO UBB.SOFT.TMS
channel class PC_PS2: KEYBOARD MOUSE
component class CON_RS232: J9
channel class CON_USERJTAG_10WBOXHDRRAM: CON_UBA CON_USERBOARDB
component class CON_BATT: BT1
component class CON_USB: J4
net class DEBA.D[7..0]: DEBA.D0 DEBA.D1 DEBA.D2 DEBA.D3 DEBA.D4 DEBA.D5 DEBA.D6 DEBA.D7
net class DEBB.D[7..0]: DEBB.D0 DEBB.D1 DEBB.D2 DEBB.D3 DEBB.D4 DEBB.D5 DEBB.D6 DEBB.D7
net class DEBA: DEBA.D0 DEBA.D1 DEBA.D2 DEBA.D3 DEBA.D4 DEBA.D5 DEBA.D6 DEBA.D7
net class DEBB: DEBB.D0 DEBB.D1 DEBB.D2 DEBB.D3 DEBB.D4 DEBB.D5 DEBB.D6 DEBB.D7
channel class CON_DEBUG_10WBOXHDRRAM: CON_DEBUGA CON_DEBUGB
component class CON_PC_PPORT: HDR6
component class CON_NANOTALK: HDR4 HDR5
net class PPRT.D[7..0]: PPRT.D0 PPRT.D1 PPRT.D2 PPRT.D3 PPRT.D4 PPRT.D5 PPRT.D6 PPRT.D7
net class PPRT#.D[7..0]: PPRT#.D0 PPRT#.D1 PPRT#.D2 PPRT#.D3 PPRT#.D4 PPRT#.D5 PPRT#.D6 PPRT#.D7
net class PPRT#: PPRT#.ACK PPRT#.AUTOFD PPRT#.BUSY PPRT#.D0 PPRT#.D1 PPRT#.D2 PPRT#.D3 PPRT#.D4 PPRT#.D5 PPRT#.D6 PPRT#.D7 PPRT#.DETECT PPRT#.ERROR PPRT#.INIT PPRT#.ONE_WIRE_P PPRT#.PE PPRT#.SELECT PPRT#.SELECTIN PPRT#.STROBE
net class PPRT: PPRT.ACK PPRT.AUTOFD PPRT.BUSY PPRT.D0 PPRT.D1 PPRT.D2 PPRT.D3 PPRT.D4 PPRT.D5 PPRT.D6 PPRT.D7 PPRT.ERROR PPRT.INIT PPRT.PE PPRT.PLUG PPRT.SELECT PPRT.SELECTIN PPRT.STROBE
component class PDA_SWITCHES: IC1 R153 R154 R155 R156 R157 SW1 SW2 SW3 SW4 SW5
net class DIPSW.D[7..0]: DIPSW.D0 DIPSW.D1 DIPSW.D2 DIPSW.D3 DIPSW.D4 DIPSW.D5 DIPSW.D6 DIPSW.D7
net class DAU_PROG.ID[3..0]: DAU_PROG.ID0 DAU_PROG.ID1 DAU_PROG.ID2 DAU_PROG.ID3
net class DAU_PROG.M[2..0]: DAU_PROG.M0 DAU_PROG.M1 DAU_PROG.M2
component class DB_RESET: R158 SW8
component class HOST_RESET: R159 SW9
net class DAU_JTAG: DAU_JTAG.HARD.TCK DAU_JTAG.HARD.TDI DAU_JTAG.HARD.TDO DAU_JTAG.HARD.TMS DAU_JTAG.SOFT.TCK DAU_JTAG.SOFT.TDI DAU_JTAG.SOFT.TDO DAU_JTAG.SOFT.TMS
net class DAU_PROG: DAU_PROG.CCLK DAU_PROG.DIN DAU_PROG.DONE DAU_PROG.ID0 DAU_PROG.ID1 DAU_PROG.ID2 DAU_PROG.ID3 DAU_PROG.INIT DAU_PROG.INSTALLED DAU_PROG.M0 DAU_PROG.M1 DAU_PROG.M2 DAU_PROG.PROG_CLK DAU_PROG.PROG_PWR_ON DAU_PROG.PROGRAM
net class DIPSW: DIPSW.D0 DIPSW.D1 DIPSW.D2 DIPSW.D3 DIPSW.D4 DIPSW.D5 DIPSW.D6 DIPSW.D7
channel class NB2_PBCON: PBA PBB PBC
net class AOUT_PBA: AOUTA.L AOUTA.R
net class AOUT_PBB: AOUTB.L AOUTB.R
net class UIO.IO[35..0]: UIO.IO0 UIO.IO1 UIO.IO2 UIO.IO3 UIO.IO4 UIO.IO5 UIO.IO6 UIO.IO7 UIO.IO8 UIO.IO9 UIO.IO10 UIO.IO11 UIO.IO12 UIO.IO13 UIO.IO14 UIO.IO15 UIO.IO16 UIO.IO17 UIO.IO18 UIO.IO19 UIO.IO20 UIO.IO21 UIO.IO22 UIO.IO23 UIO.IO24 UIO.IO25 UIO.IO26 UIO.IO27 UIO.IO28 UIO.IO29 UIO.IO30 UIO.IO31 UIO.IO32 UIO.IO33 UIO.IO34 UIO.IO35
net class UIO: UIO.IO0 UIO.IO1 UIO.IO2 UIO.IO3 UIO.IO4 UIO.IO5 UIO.IO6 UIO.IO7 UIO.IO8 UIO.IO9 UIO.IO10 UIO.IO11 UIO.IO12 UIO.IO13 UIO.IO14 UIO.IO15 UIO.IO16 UIO.IO17 UIO.IO18 UIO.IO19 UIO.IO20 UIO.IO21 UIO.IO22 UIO.IO23 UIO.IO24 UIO.IO25 UIO.IO26 UIO.IO27 UIO.IO28 UIO.IO29 UIO.IO30 UIO.IO31 UIO.IO32 UIO.IO33 UIO.IO34 UIO.IO35
component class NB_ID: D12 R160 R161 U19
net class EXT_A.D[49..0]: EXT_A.D0 EXT_A.D1 EXT_A.D2 EXT_A.D3 EXT_A.D4 EXT_A.D5 EXT_A.D6 EXT_A.D7 EXT_A.D8 EXT_A.D9 EXT_A.D10 EXT_A.D11 EXT_A.D12 EXT_A.D13 EXT_A.D14 EXT_A.D15 EXT_A.D16 EXT_A.D17 EXT_A.D18 EXT_A.D19 EXT_A.D20 EXT_A.D21 EXT_A.D22 EXT_A.D23 EXT_A.D24 EXT_A.D25 EXT_A.D26 EXT_A.D27 EXT_A.D28 EXT_A.D29 EXT_A.D30 EXT_A.D31 EXT_A.D32 EXT_A.D33 EXT_A.D34 EXT_A.D35 EXT_A.D36 EXT_A.D37 EXT_A.D38 EXT_A.D39 EXT_A.D40 EXT_A.D41 EXT_A.D42 EXT_A.D43 EXT_A.D44 EXT_A.D45 EXT_A.D46 EXT_A.D47 EXT_A.D48 EXT_A.D49
net class EXT_A: EXT_A.D0 EXT_A.D1 EXT_A.D2 EXT_A.D3 EXT_A.D4 EXT_A.D5 EXT_A.D6 EXT_A.D7 EXT_A.D8 EXT_A.D9 EXT_A.D10 EXT_A.D11 EXT_A.D12 EXT_A.D13 EXT_A.D14 EXT_A.D15 EXT_A.D16 EXT_A.D17 EXT_A.D18 EXT_A.D19 EXT_A.D20 EXT_A.D21 EXT_A.D22 EXT_A.D23 EXT_A.D24 EXT_A.D25 EXT_A.D26 EXT_A.D27 EXT_A.D28 EXT_A.D29 EXT_A.D30 EXT_A.D31 EXT_A.D32 EXT_A.D33 EXT_A.D34 EXT_A.D35 EXT_A.D36 EXT_A.D37 EXT_A.D38 EXT_A.D39 EXT_A.D40 EXT_A.D41 EXT_A.D42 EXT_A.D43 EXT_A.D44 EXT_A.D45 EXT_A.D46 EXT_A.D47 EXT_A.D48 EXT_A.D49
net class EXT_B.D[49..0]: EXT_B.D0 EXT_B.D1 EXT_B.D2 EXT_B.D3 EXT_B.D4 EXT_B.D5 EXT_B.D6 EXT_B.D7 EXT_B.D8 EXT_B.D9 EXT_B.D10 EXT_B.D11 EXT_B.D12 EXT_B.D13 EXT_B.D14 EXT_B.D15 EXT_B.D16 EXT_B.D17 EXT_B.D18 EXT_B.D19 EXT_B.D20 EXT_B.D21 EXT_B.D22 EXT_B.D23 EXT_B.D24 EXT_B.D25 EXT_B.D26 EXT_B.D27 EXT_B.D28 EXT_B.D29 EXT_B.D30 EXT_B.D31 EXT_B.D32 EXT_B.D33 EXT_B.D34 EXT_B.D35 EXT_B.D36 EXT_B.D37 EXT_B.D38 EXT_B.D39 EXT_B.D40 EXT_B.D41 EXT_B.D42 EXT_B.D43 EXT_B.D44 EXT_B.D45 EXT_B.D46 EXT_B.D47 EXT_B.D48 EXT_B.D49
net class EXT_B: EXT_B.D0 EXT_B.D1 EXT_B.D2 EXT_B.D3 EXT_B.D4 EXT_B.D5 EXT_B.D6 EXT_B.D7 EXT_B.D8 EXT_B.D9 EXT_B.D10 EXT_B.D11 EXT_B.D12 EXT_B.D13 EXT_B.D14 EXT_B.D15 EXT_B.D16 EXT_B.D17 EXT_B.D18 EXT_B.D19 EXT_B.D20 EXT_B.D21 EXT_B.D22 EXT_B.D23 EXT_B.D24 EXT_B.D25 EXT_B.D26 EXT_B.D27 EXT_B.D28 EXT_B.D29 EXT_B.D30 EXT_B.D31 EXT_B.D32 EXT_B.D33 EXT_B.D34 EXT_B.D35 EXT_B.D36 EXT_B.D37 EXT_B.D38 EXT_B.D39 EXT_B.D40 EXT_B.D41 EXT_B.D42 EXT_B.D43 EXT_B.D44 EXT_B.D45 EXT_B.D46 EXT_B.D47 EXT_B.D48 EXT_B.D49
net class EXT_C.D[49..0]: EXT_C.D0 EXT_C.D1 EXT_C.D2 EXT_C.D3 EXT_C.D4 EXT_C.D5 EXT_C.D6 EXT_C.D7 EXT_C.D8 EXT_C.D9 EXT_C.D10 EXT_C.D11 EXT_C.D12 EXT_C.D13 EXT_C.D14 EXT_C.D15 EXT_C.D16 EXT_C.D17 EXT_C.D18 EXT_C.D19 EXT_C.D20 EXT_C.D21 EXT_C.D22 EXT_C.D23 EXT_C.D24 EXT_C.D25 EXT_C.D26 EXT_C.D27 EXT_C.D28 EXT_C.D29 EXT_C.D30 EXT_C.D31 EXT_C.D32 EXT_C.D33 EXT_C.D34 EXT_C.D35 EXT_C.D36 EXT_C.D37 EXT_C.D38 EXT_C.D39 EXT_C.D40 EXT_C.D41 EXT_C.D42 EXT_C.D43 EXT_C.D44 EXT_C.D45 EXT_C.D46 EXT_C.D47 EXT_C.D48 EXT_C.D49
net class EXT_C: EXT_C.D0 EXT_C.D1 EXT_C.D2 EXT_C.D3 EXT_C.D4 EXT_C.D5 EXT_C.D6 EXT_C.D7 EXT_C.D8 EXT_C.D9 EXT_C.D10 EXT_C.D11 EXT_C.D12 EXT_C.D13 EXT_C.D14 EXT_C.D15 EXT_C.D16 EXT_C.D17 EXT_C.D18 EXT_C.D19 EXT_C.D20 EXT_C.D21 EXT_C.D22 EXT_C.D23 EXT_C.D24 EXT_C.D25 EXT_C.D26 EXT_C.D27 EXT_C.D28 EXT_C.D29 EXT_C.D30 EXT_C.D31 EXT_C.D32 EXT_C.D33 EXT_C.D34 EXT_C.D35 EXT_C.D36 EXT_C.D37 EXT_C.D38 EXT_C.D39 EXT_C.D40 EXT_C.D41 EXT_C.D42 EXT_C.D43 EXT_C.D44 EXT_C.D45 EXT_C.D46 EXT_C.D47 EXT_C.D48 EXT_C.D49
net class MEM.BUS_NBE[3..0]: MEM.BUS_NBE0 MEM.BUS_NBE1 MEM.BUS_NBE2 MEM.BUS_NBE3
net class MEM: MEM.BUS_A1 MEM.BUS_A2 MEM.BUS_A3 MEM.BUS_A4 MEM.BUS_A5 MEM.BUS_A6 MEM.BUS_A7 MEM.BUS_A8 MEM.BUS_A9 MEM.BUS_A10 MEM.BUS_A11 MEM.BUS_A12 MEM.BUS_A13 MEM.BUS_A14 MEM.BUS_A15 MEM.BUS_A16 MEM.BUS_A17 MEM.BUS_A18 MEM.BUS_A19 MEM.BUS_A20 MEM.BUS_A21 MEM.BUS_A22 MEM.BUS_A23 MEM.BUS_A24 MEM.BUS_D0 MEM.BUS_D1 MEM.BUS_D2 MEM.BUS_D3 MEM.BUS_D4 MEM.BUS_D5 MEM.BUS_D6 MEM.BUS_D7 MEM.BUS_D8 MEM.BUS_D9 MEM.BUS_D10 MEM.BUS_D11 MEM.BUS_D12 MEM.BUS_D13 MEM.BUS_D14 MEM.BUS_D15 MEM.BUS_D16 MEM.BUS_D17 MEM.BUS_D18 MEM.BUS_D19 MEM.BUS_D20 MEM.BUS_D21 MEM.BUS_D22 MEM.BUS_D23 MEM.BUS_D24 MEM.BUS_D25 MEM.BUS_D26 MEM.BUS_D27 MEM.BUS_D28 MEM.BUS_D29 MEM.BUS_D30 MEM.BUS_D31 MEM.BUS_FLASH_NBUSY MEM.BUS_FLASH_NCS MEM.BUS_FLASH_NRESET MEM.BUS_NBE0 MEM.BUS_NBE1 MEM.BUS_NBE2 MEM.BUS_NBE3 MEM.BUS_NOE MEM.BUS_NWE MEM.BUS_SDRAM_CKE MEM.BUS_SDRAM_CLK MEM.BUS_SDRAM_NCAS MEM.BUS_SDRAM_NCS MEM.BUS_SDRAM_NRAS MEM.BUS_SRAM_NCS
component class PSU_16V5: C139 C140 C141 C142 C143 C144 D5 L1 R63 R64 R65 TP8 U11
component class PSU_9V0: C132 C133 C134 R57 R58 R59 TP6 U9
component class PSU-7V5: C128 C129 C130 C131 D2 D3 R56 TP5
component class PSU_1V2: C145 C146 C147 C148 C149 C150 C151 C152 L2 R66 R67 R68 R69 R70 TP9 U12
component class PSU_1V8: C157 C158 C159 C160 D6 R73 R74 R75 TP10 U14
component class PSU_2V5: C161 C162 C163 C164 D7 R76 R77 R78 TP11 U15
component class PSU_3V3: C165 C166 C167 C168 D8 R79 R80 R81 TP12 U16
component class PSU_VCCX: C135 C136 C137 C138 D4 R60 R61 R62 TP7 U10
net class AD.AIN[3..0]: AD.AIN0 AD.AIN1 AD.AIN2 AD.AIN3
net class AD.AOUT[3..0]: AD.AOUT0 AD.AOUT1 AD.AOUT2 AD.AOUT3
net class AD: AD.AIN0 AD.AIN1 AD.AIN2 AD.AIN3 AD.AOUT0 AD.AOUT1 AD.AOUT2 AD.AOUT3 AD.I2C.SCL AD.I2C.SDA
net class AOUT: AIN.L AIN.R AOUTA.L AOUTA.R AOUTB.L AOUTB.R
net class CLOCKS: PBCTRLA.CLK.CLK0 PBCTRLA.CLK.CLK1 PBCTRLA.CLK.CLK2 PBCTRLA.CLK.EN PBCTRLB.CLK.CLK0 PBCTRLB.CLK.CLK1 PBCTRLB.CLK.CLK2 PBCTRLB.CLK.EN PBCTRLC.CLK.CLK0 PBCTRLC.CLK.CLK1 PBCTRLC.CLK.CLK2 PBCTRLC.CLK.EN
net class DAU_CLK: CLKPLL.CLK_FIXED CLKPLL.CLK_PROG DAU_CLK.FPGA_CLK1
net class I2C: AD.I2C.SCL AD.I2C.SDA
net class ONE_WIRE: PBCTRLA.1W.ID PBCTRLA.1W.PIO1 PBCTRLA.1W.PIO2 PBCTRLB.1W.ID PBCTRLB.1W.PIO1 PBCTRLB.1W.PIO2 PBCTRLC.1W.ID PBCTRLC.1W.PIO1 PBCTRLC.1W.PIO2
net class PBCTRLA.1W.PIO[1..2]: PBCTRLA.1W.PIO1 PBCTRLA.1W.PIO2
net class PBCTRLA.CLK.CLK[2..0]: PBCTRLA.CLK.CLK0 PBCTRLA.CLK.CLK1 PBCTRLA.CLK.CLK2
net class PBCTRLA.SPARE[1..4]: PBCTRLA.SPARE1 PBCTRLA.SPARE2 PBCTRLA.SPARE3 PBCTRLA.SPARE4
net class PBCTRLA: PBCTRLA.1W.ID PBCTRLA.1W.PIO1 PBCTRLA.1W.PIO2 PBCTRLA.CLK.CLK0 PBCTRLA.CLK.CLK1 PBCTRLA.CLK.CLK2 PBCTRLA.CLK.EN PBCTRLA.JTAG.DETECT PBCTRLA.JTAG.HARD.TCK PBCTRLA.JTAG.HARD.TDI PBCTRLA.JTAG.HARD.TDO PBCTRLA.JTAG.HARD.TMS PBCTRLA.JTAG.SOFT.TCK PBCTRLA.JTAG.SOFT.TDI PBCTRLA.JTAG.SOFT.TDO PBCTRLA.JTAG.SOFT.TMS PBCTRLA.SPARE1 PBCTRLA.SPARE2 PBCTRLA.SPARE3 PBCTRLA.SPARE4 PBCTRLA.SPI_CS_N0 PBCTRLA.SPI_CS_N1
net class PBCTRLB.1W.PIO[1..2]: PBCTRLB.1W.PIO1 PBCTRLB.1W.PIO2
net class PBCTRLB.CLK.CLK[2..0]: PBCTRLB.CLK.CLK0 PBCTRLB.CLK.CLK1 PBCTRLB.CLK.CLK2
net class PBCTRLB.SPARE[1..4]: PBCTRLB.SPARE1 PBCTRLB.SPARE2 PBCTRLB.SPARE3 PBCTRLB.SPARE4
net class PBCTRLB: PBCTRLB.1W.ID PBCTRLB.1W.PIO1 PBCTRLB.1W.PIO2 PBCTRLB.CLK.CLK0 PBCTRLB.CLK.CLK1 PBCTRLB.CLK.CLK2 PBCTRLB.CLK.EN PBCTRLB.JTAG.DETECT PBCTRLB.JTAG.HARD.TCK PBCTRLB.JTAG.HARD.TDI PBCTRLB.JTAG.HARD.TDO PBCTRLB.JTAG.HARD.TMS PBCTRLB.JTAG.SOFT.TCK PBCTRLB.JTAG.SOFT.TDI PBCTRLB.JTAG.SOFT.TDO PBCTRLB.JTAG.SOFT.TMS PBCTRLB.SPARE1 PBCTRLB.SPARE2 PBCTRLB.SPARE3 PBCTRLB.SPARE4 PBCTRLB.SPI_CS_N0 PBCTRLB.SPI_CS_N1
net class PBCTRLC.1W.PIO[1..2]: PBCTRLC.1W.PIO1 PBCTRLC.1W.PIO2
net class PBCTRLC.CLK.CLK[2..0]: PBCTRLC.CLK.CLK0 PBCTRLC.CLK.CLK1 PBCTRLC.CLK.CLK2
net class PBCTRLC.SPARE[1..4]: PBCTRLC.SPARE1 PBCTRLC.SPARE2 PBCTRLC.SPARE3 PBCTRLC.SPARE4
net class PBCTRLC: PBCTRLC.1W.ID PBCTRLC.1W.PIO1 PBCTRLC.1W.PIO2 PBCTRLC.CLK.CLK0 PBCTRLC.CLK.CLK1 PBCTRLC.CLK.CLK2 PBCTRLC.CLK.EN PBCTRLC.JTAG.DETECT PBCTRLC.JTAG.HARD.TCK PBCTRLC.JTAG.HARD.TDI PBCTRLC.JTAG.HARD.TDO PBCTRLC.JTAG.HARD.TMS PBCTRLC.JTAG.SOFT.TCK PBCTRLC.JTAG.SOFT.TDI PBCTRLC.JTAG.SOFT.TDO PBCTRLC.JTAG.SOFT.TMS PBCTRLC.SPARE1 PBCTRLC.SPARE2 PBCTRLC.SPARE3 PBCTRLC.SPARE4 PBCTRLC.SPI_CS_N0 PBCTRLC.SPI_CS_N1
net class AOUT_PBC: AIN.L AIN.R
net class AIN: AIN.L AIN.R AOUTC.L AOUTC.MIC AOUTC.R
net class AOUTC: AOUTC.L AOUTC.MIC AOUTC.R
component class "RT CLOCK": C10 C11 R1 R2 TP2 TP15 U2 Y1
component class USER_BOARD_A: R244 R245 R246 R247 R248 R249 R250 R251 R252 R253 R254 R255 R256 R257 R258 R259 R260 R261
component class USER_BOARD_B: R262 R263 R264 R265 R266 R267 R268 R269 R270 R271 R272 R273 R274 R275 R276 R277 R278 R279
net class CLKPLL: CLKPLL.CLK_FIXED CLKPLL.CLK_PROG CLKPLL.CS_N CLKPLL.DIN CLKPLL.SCLK
net class RTC: RTC.CS_N RTC.DIN RTC.DOUT RTC.RST_N RTC.SCLK
component class COMP_5V0: J1 J2 J3 SW6
component class CON_PSU: F1 J1 J2 J3 SW6 TP1
component class USER_LEDS: LED9 LED10 LED11 LED12 LED13 LED14 LED15 LED16 R100 R101 R102 R103 R104 R105 R106 R107
component class CON_DEBUGA: D9 DH1 F3
component class CON_DEBUGB: D10 DH2 F4
component class CON_HOSTJTAG: D11 F5 HDR3
component class CON_CAN: F2 J7 JP3

## Components (designator, comment, footprint, x,y, rotation, side; value= is the part's Value field where it differs from the comment)
"Altium Logo BOT1" "Altium" Logo-Altium 6737.94,635 r180 bottom
"Altium Logo Top1" "Altium" Logo-Altium 6948.68,727.45 r0 top
BT1 "CELLBATT 20mm HEADER" CELL_HOLDER 9597.44,5444.88 r180 top locked
C1 "220uF 10V" CAPC7343-STAR 5873.5,5290.53 r180 bottom locked
C2 "220uF 10V" CAPC7343-STAR 537.93,1136.74 r270 bottom
C3 "220uF 10V" CAPC7343-STAR 1968.5,4177.17 r0 bottom
C4 "220uF 10V" CAPC7343-STAR 2429.13,5972.44 r0 bottom locked
C5 "100pF 50V" CAPC1005-STAR 8270.97,1277.52 r90 bottom (schematic designator C2)
C6 "100pF 50V" CAPC1005-STAR 8370.97,1277.52 r90 bottom (schematic designator C3)
C7 "100pF 50V" CAPC1005-STAR 8470.97,1277.52 r90 bottom (schematic designator C4)
C8 "100pF 50V" CAPC1005-STAR 8570.97,1277.52 r90 bottom (schematic designator C5)
C9 "0.1uF 16V" CAPC1005-STAR 7514.54,1507.81 r270 bottom (schematic designator C1)
C10 "10uF 20V" CAPC3528-STAR 8690.56,4992.74 r270 bottom (schematic designator C2)
C11 "0.1uF 16V" CAPC1005-STAR 9305.73,4823.54 r180 bottom (schematic designator C3)
C12 "15pF 50V" CAPC1005-STAR 6799.21,2185.04 r0 bottom locked (schematic designator C1)
C13 "15pF 50V" CAPC1005-STAR 6311.02,2185.04 r180 bottom locked (schematic designator C2)
C14 "0.1uF 16V" CAPC1005-STAR 6307.09,2039.37 r180 bottom locked (schematic designator C4)
C15 "10uF 20V" CAPC3528-STAR 6801.5,2020.58 r270 bottom locked (schematic designator C3)
C16 "10uF 20V" CAPC3528-STAR 8329.94,1623 r180 bottom locked (schematic designator C1)
C17 "0.1uF 16V" CAPC1005-STAR 8314.2,1485.2 r180 bottom locked (schematic designator C1)
C18 "10uF 20V" CAPC3528-STAR 10621.45,3751.95 r270 bottom (schematic designator C42_FP)
C19 "10uF 20V" CAPC3528-STAR 10621.47,3130.01 r270 bottom (schematic designator C43_FP)
C20 "10uF 20V" CAPC3528-STAR 10303.13,4078.15 r0 bottom locked (schematic designator C103_FP)
C21 "10uF 20V" CAPC3528-STAR 9681.19,4078.16 r0 bottom (schematic designator C45_FP)
C22 "10uF 20V" CAPC3528-STAR 10295.25,2811.7 r0 bottom (schematic designator C104_FP)
C23 "10uF 20V" CAPC3528-STAR 9355.01,3137.88 r270 bottom (schematic designator C1_FP)
C24 "10uF 20V" CAPC3528-STAR 9673.32,2811.7 r0 bottom (schematic designator C2_FP)
C25 "10uF 20V" CAPC3528-STAR 9355.01,3759.81 r270 bottom locked (schematic designator C3_FP)
C26 "0.1uF 16V" CAPC1005-STAR 10216.54,3279.53 r45 bottom (schematic designator C5_FP)
C27 "0.1uF 16V" CAPC1005-STAR 9822.84,3216.53 r315 bottom (schematic designator C8_FP)
C28 "0.1uF 16V" CAPC1005-STAR 10216.54,3610.24 r315 bottom (schematic designator C9_FP)
C29 "0.1uF 16V" CAPC1005-STAR 9759.84,3610.24 r225 bottom (schematic designator C11_FP)
C30 "10nF 16V" CAPC1005-STAR 10153.54,3216.53 r225 bottom (schematic designator C13_FP)
C31 "10nF 16V" CAPC1005-STAR 9822.84,3673.23 r45 bottom (schematic designator C15_FP)
C32 "10nF 16V" CAPC1005-STAR 9759.84,3279.53 r135 bottom (schematic designator C16_FP)
C33 "10nF 16V" CAPC1005-STAR 10153.54,3673.23 r135 bottom (schematic designator C18_FP)
C34 "10uF 20V" CAPC3528-STAR 10555.25,2872.35 r225 bottom (schematic designator C44_FP)
C35 "10uF 20V" CAPC3528-STAR 9415.57,2877.92 r315 bottom (schematic designator C102_FP)
C36 "10uF 20V" CAPC3528-STAR 10560.82,4011.86 r315 bottom (schematic designator C20_FP)
C37 "10uF 20V" CAPC3528-STAR 9421.13,4017.43 r225 bottom (schematic designator C21_FP)
C38 "0.1uF 16V" CAPC1005-STAR 10216.85,3965.16 r0 bottom locked (schematic designator C22_FP)
C39 "0.1uF 16V" CAPC1005-STAR 10507.28,3673.54 r90 bottom locked (schematic designator C23_FP)
C40 "0.1uF 16V" CAPC1005-STAR 9468.49,3216.53 r270 bottom locked (schematic designator C24_FP)
C41 "0.1uF 16V" CAPC1005-STAR 9759.68,3963.45 r180 bottom (schematic designator C25_FP)
C42 "0.1uF 16V" CAPC1005-STAR 10216.85,2925.79 r0 bottom locked (schematic designator C26_FP)
C43 "10nF 16V" CAPC1005-STAR 10429.73,2953.47 r90 bottom locked (schematic designator C27_FP)
C44 "10nF 16V" CAPC1005-STAR 9469.09,3673.94 r90 bottom locked (schematic designator C28_FP)
C45 "10nF 16V" CAPC1005-STAR 9546.65,3936.3 r270 bottom locked (schematic designator C29_FP)
C46 "10nF 16V" CAPC1005-STAR 10428.54,3936.3 r270 bottom locked (schematic designator C30_FP)
C47 "10nF 16V" CAPC1005-STAR 9496.77,3003.35 r0 bottom locked (schematic designator C31_FP)
C48 "10nF 16V" CAPC1005-STAR 10479.61,3004.53 r180 bottom locked (schematic designator C32_FP)
C49 "10nF 16V" CAPC1005-STAR 10479.61,3886.42 r180 bottom locked (schematic designator C33_FP)
C50 "10nF 16V" CAPC1005-STAR 9547.84,2953.47 r90 bottom locked (schematic designator C34_FP)
C51 "10nF 16V" CAPC1005-STAR 10507.28,3215.83 r270 bottom locked (schematic designator C35_FP)
C52 "10nF 16V" CAPC1005-STAR 9759.13,2925.79 r180 bottom locked (schematic designator C36_FP)
C53 "10nF 16V" CAPC1005-STAR 9496.77,3885.24 r0 bottom locked (schematic designator C37_FP)
C54 "10uF 20V" CAPC3528-STAR 9984.3,2811.7 r0 bottom (schematic designator C38_FP)
C55 "10uF 20V" CAPC3528-STAR 10621.47,3441 r270 bottom (schematic designator C39_FP)
C56 "10uF 20V" CAPC3528-STAR 9992.16,4078.15 r0 bottom locked (schematic designator C40_FP)
C57 "10uF 20V" CAPC3528-STAR 9355.01,3448.87 r270 bottom (schematic designator C41_FP)
C58 "0.1uF 16V" CAPC1005-STAR 10224.68,3429.45 r0 bottom (schematic designator C72_FP)
C59 "0.1uF 16V" CAPC1005-STAR 9752.68,3460.45 r180 bottom (schematic designator C75_FP)
C60 "0.1uF 16V" CAPC1005-STAR 9972.44,3681.1 r90 bottom (schematic designator C76_FP)
C61 "0.1uF 16V" CAPC1005-STAR 9752.68,3429.45 r180 bottom (schematic designator C77_FP)
C62 "0.1uF 16V" CAPC1005-STAR 9973.68,3360.64 r270 bottom (schematic designator C78_FP)
C63 "0.1uF 16V" CAPC1005-STAR 10072.49,3429.45 r0 bottom (schematic designator C86_FP)
C64 "0.1uF 16V" CAPC1005-STAR 9903.87,3460.45 r180 bottom (schematic designator C90_FP)
C65 "0.1uF 16V" CAPC1005-STAR 10224.68,3460.45 r0 bottom (schematic designator C92_FP)
C66 "0.1uF 16V" CAPC1005-STAR 10003.94,3681.1 r90 bottom (schematic designator C93_FP)
C67 "0.1uF 16V" CAPC1005-STAR 10003.94,3208.66 r270 bottom (schematic designator C83_FP)
C68 "0.1uF 16V" CAPC1005-STAR 9972.44,3208.66 r270 bottom (schematic designator C82_FP)
C69 "0.1uF 16V" CAPC1005-STAR 10453.68,3090.45 r270 bottom (schematic designator C46_FP)
C70 "0.1uF 16V" CAPC1005-STAR 10342.68,2979.45 r0 bottom (schematic designator C47_FP)
C71 "0.1uF 16V" CAPC1005-STAR 10080.68,2960.45 r270 bottom (schematic designator C48_FP)
C72 "0.1uF 16V" CAPC1005-STAR 9503.68,3353.45 r180 bottom (schematic designator C49_FP)
C73 "0.1uF 16V" CAPC1005-STAR 10454.68,3799.45 r90 bottom (schematic designator C50_FP)
C74 "0.1uF 16V" CAPC1005-STAR 10474.68,3353.45 r0 bottom (schematic designator C51_FP)
C75 "0.1uF 16V" CAPC1005-STAR 9476.76,3092.36 r270 bottom (schematic designator C52_FP)
C76 "0.1uF 16V" CAPC1005-STAR 9896.68,2960.45 r270 bottom (schematic designator C53_FP)
C77 "0.1uF 16V" CAPC1005-STAR 9503.94,3530.91 r180 bottom locked (schematic designator C54_FP)
C78 "0.1uF 16V" CAPC1005-STAR 9633.68,3909.45 r180 bottom (schematic designator C55_FP)
C79 "0.1uF 16V" CAPC1005-STAR 10342.84,3906.1 r0 bottom locked (schematic designator C56_FP)
C80 "0.1uF 16V" CAPC1005-STAR 9526.97,3799.53 r90 bottom locked (schematic designator C57_FP)
C81 "0.1uF 16V" CAPC1005-STAR 9633.54,2983.66 r180 bottom locked (schematic designator C58_FP)
C82 "0.1uF 16V" CAPC1005-STAR 10475.68,3536.45 r0 bottom (schematic designator C59_FP)
C83 "0.1uF 16V" CAPC1005-STAR 10077.68,3929.45 r90 bottom (schematic designator C60_FP)
C84 "0.1uF 16V" CAPC1005-STAR 9897.68,3929.45 r90 bottom (schematic designator C61_FP)
C85 "10nF 16V" CAPC1005-STAR 9828.74,3429.14 r0 bottom (schematic designator C62_FP)
C86 "10nF 16V" CAPC1005-STAR 9972.44,3604.33 r270 bottom (schematic designator C63_FP)
C87 "10nF 16V" CAPC1005-STAR 10342.68,3956.31 r0 bottom (schematic designator C64_FP)
C88 "10nF 16V" CAPC1005-STAR 10342.68,2933.45 r0 bottom (schematic designator C65_FP)
C89 "10nF 16V" CAPC1005-STAR 9633.7,3956.31 r180 bottom (schematic designator C66_FP)
C90 "10nF 16V" CAPC1005-STAR 10474.68,3588.45 r0 bottom (schematic designator C67_FP)
C91 "10nF 16V" CAPC1005-STAR 10148.62,3460.63 r180 bottom (schematic designator C68_FP)
C92 "10nF 16V" CAPC1005-STAR 9972.68,3528.26 r90 bottom (schematic designator C69_FP)
C93 "10nF 16V" CAPC1005-STAR 10003.68,3528.26 r90 bottom (schematic designator C70_FP)
C94 "10nF 16V" CAPC1005-STAR 10003.94,3604.33 r270 bottom (schematic designator C71_FP)
C95 "10nF 16V" CAPC1005-STAR 10148.62,3429.13 r180 bottom (schematic designator C73_FP)
C96 "10nF 16V" CAPC1005-STAR 10072.49,3460.45 r0 bottom (schematic designator C74_FP)
C97 "10nF 16V" CAPC1005-STAR 9842.68,2960.45 r270 bottom (schematic designator C79_FP)
C98 "10nF 16V" CAPC1005-STAR 9526.97,3089.84 r270 bottom locked (schematic designator C80_FP)
C99 "10nF 16V" CAPC1005-STAR 9633.7,2933.45 r180 bottom (schematic designator C81_FP)
C100 "10nF 16V" CAPC1005-STAR 9972.44,3285.43 r90 bottom (schematic designator C84_FP)
C101 "10nF 16V" CAPC1005-STAR 10498.68,3799.45 r90 bottom (schematic designator C85_FP)
C102 "10nF 16V" CAPC1005-STAR 10474.68,3299.45 r0 bottom (schematic designator C101_FP)
C103 "10nF 16V" CAPC1005-STAR 10132.68,2960.45 r270 bottom (schematic designator C87_FP)
C104 "10nF 16V" CAPC1005-STAR 10003.94,3285.43 r90 bottom (schematic designator C88_FP)
C105 "10nF 16V" CAPC1005-STAR 9828.74,3460.63 r0 bottom (schematic designator C89_FP)
C106 "10nF 16V" CAPC1005-STAR 9476.76,3797.41 r90 bottom (schematic designator C100_FP)
C107 "10nF 16V" CAPC1005-STAR 9903.87,3429.45 r180 bottom (schematic designator C91_FP)
C108 "10nF 16V" CAPC1005-STAR 10503.94,3090.55 r270 bottom locked (schematic designator C99_FP)
C109 "10nF 16V" CAPC1005-STAR 9503.94,3591.14 r180 bottom locked (schematic designator C98_FP)
C110 "10nF 16V" CAPC1005-STAR 10003.68,3360.64 r270 bottom (schematic designator C94_FP)
C111 "10nF 16V" CAPC1005-STAR 10134.68,3929.45 r90 bottom (schematic designator C95_FP)
C112 "10nF 16V" CAPC1005-STAR 9842.68,3929.45 r90 bottom (schematic designator C96_FP)
C113 "10nF 16V" CAPC1005-STAR 9503.68,3299.45 r180 bottom (schematic designator C97_FP)
C114 "10uF 20V" CAPC3528-STAR 8876.3,1623 r180 bottom (schematic designator C2)
C115 "0.1uF 16V" CAPC1005-STAR 8181.1,2685.04 r270 bottom locked (schematic designator C17)
C116 "10uF 20V" CAPC3528-STAR 5952.76,2948.82 r90 bottom locked (schematic designator C3)
C117 "0.1uF 16V" CAPC1005-STAR 8984.25,3192.91 r180 bottom locked (schematic designator C18)
C118 "100pF 50V" CAPC1005-STAR 8177.17,2460.63 r180 bottom locked (schematic designator C1)
C119 "0.1uF 16V" CAPC1005-STAR 11062.99,4444.88 r90 bottom locked (schematic designator C1)
C120 "0.1uF 16V" CAPC1005-STAR 11208.66,4307.09 r90 bottom locked (schematic designator C2)
C121 "0.1uF 16V" CAPC1005-STAR 11082.68,4279.53 r90 bottom locked (schematic designator C3)
C122 "0.1uF 16V" CAPC1005-STAR 11208.66,4440.95 r90 bottom locked (schematic designator C4)
C123 "10uF 20V" CAPC3528-STAR 6610.3,4992.74 r270 bottom locked (schematic designator C3)
C124 "10uF 20V" CAPC3528-STAR 7107.83,4992.74 r270 bottom locked (schematic designator C2)
C125 "0.1uF 16V" CAPC1005-STAR 6800.01,4702 r180 bottom locked (schematic designator C4)
C126 "0.1uF 16V" CAPC1005-STAR 7156.74,5251.06 r0 bottom (schematic designator C1)
C127 "0.1uF 16V" CAPC1005-STAR 6907.16,5252.06 r0 bottom (schematic designator C9)
C128 "1uF 25V" CAPC3216-STAR 7027.56,2897.64 r270 bottom locked (schematic designator C2)
C129 "0.1uF 16V" CAPC1005-STAR 8389.76,2102.36 r270 bottom locked (schematic designator C3)
C130 "1uF 25V" CAPC3216-STAR 6972.44,2724.41 r0 bottom locked (schematic designator C1)
C131 "1uF 25V" CAPC3216-STAR 7283.46,2779.53 r90 bottom locked (schematic designator C4)
C132 "10uF 20V" CAPC3528-STAR 6346.46,2948.82 r90 bottom locked (schematic designator C1)
C133 "10uF 20V" CAPC3528-STAR 7551.06,2708.66 r0 bottom (schematic designator C3)
C134 "0.1uF 16V" CAPC1005-STAR 7492.13,2543.31 r0 bottom locked (schematic designator C2)
C135 "10uF 20V" CAPC3528-STAR 3019.69,1582.68 r0 bottom locked (schematic designator C1)
C136 "10uF 20V" CAPC3528-STAR 3019.68,1421.26 r0 bottom locked (schematic designator C2)
C137 "220uF 10V" CAPC7343-STAR 3098.68,2103.45 r0 bottom (schematic designator C3)
C138 "10uF 10V" CAPC2012-STAR 3283.56,1887.81 r270 bottom (schematic designator C4)
C139 "1uF 25V" CAPC3216-STAR 6503.94,2944.88 r270 bottom locked (schematic designator C1)
C140 "10uF 20V" CAPC3528-STAR 8240.16,4149.61 r90 bottom (schematic designator C2)
C141 "0.1uF 16V" CAPC1005-STAR 6035.43,2783.47 r0 bottom locked (schematic designator C3)
C142 "10uF 10V" CAPC2012-STAR 8106.75,4125.98 r270 bottom (schematic designator C4)
C143 "10uF 20V" CAPC3528-STAR 6149.61,2948.82 r90 bottom locked (schematic designator C5)